# Altium PCB SM619GEFDFST.PcbDoc (part 1 of 3)
Units mm, origin at the board's own origin, x right, y up, seen from the top; angles counter-clockwise.
Board outline 101.04 x 68 mm, 8 copper layers (Top Layer, GND, VCC3+CORE, Signal 1, +5V SATA, Middle Layer 1, GND (Mid8), Bottom Layer), stack 0.633 mm thick; 196 components, 107 nets, 647 pads, 641 vias.
Unrouted connection lines stored in the file: 30.
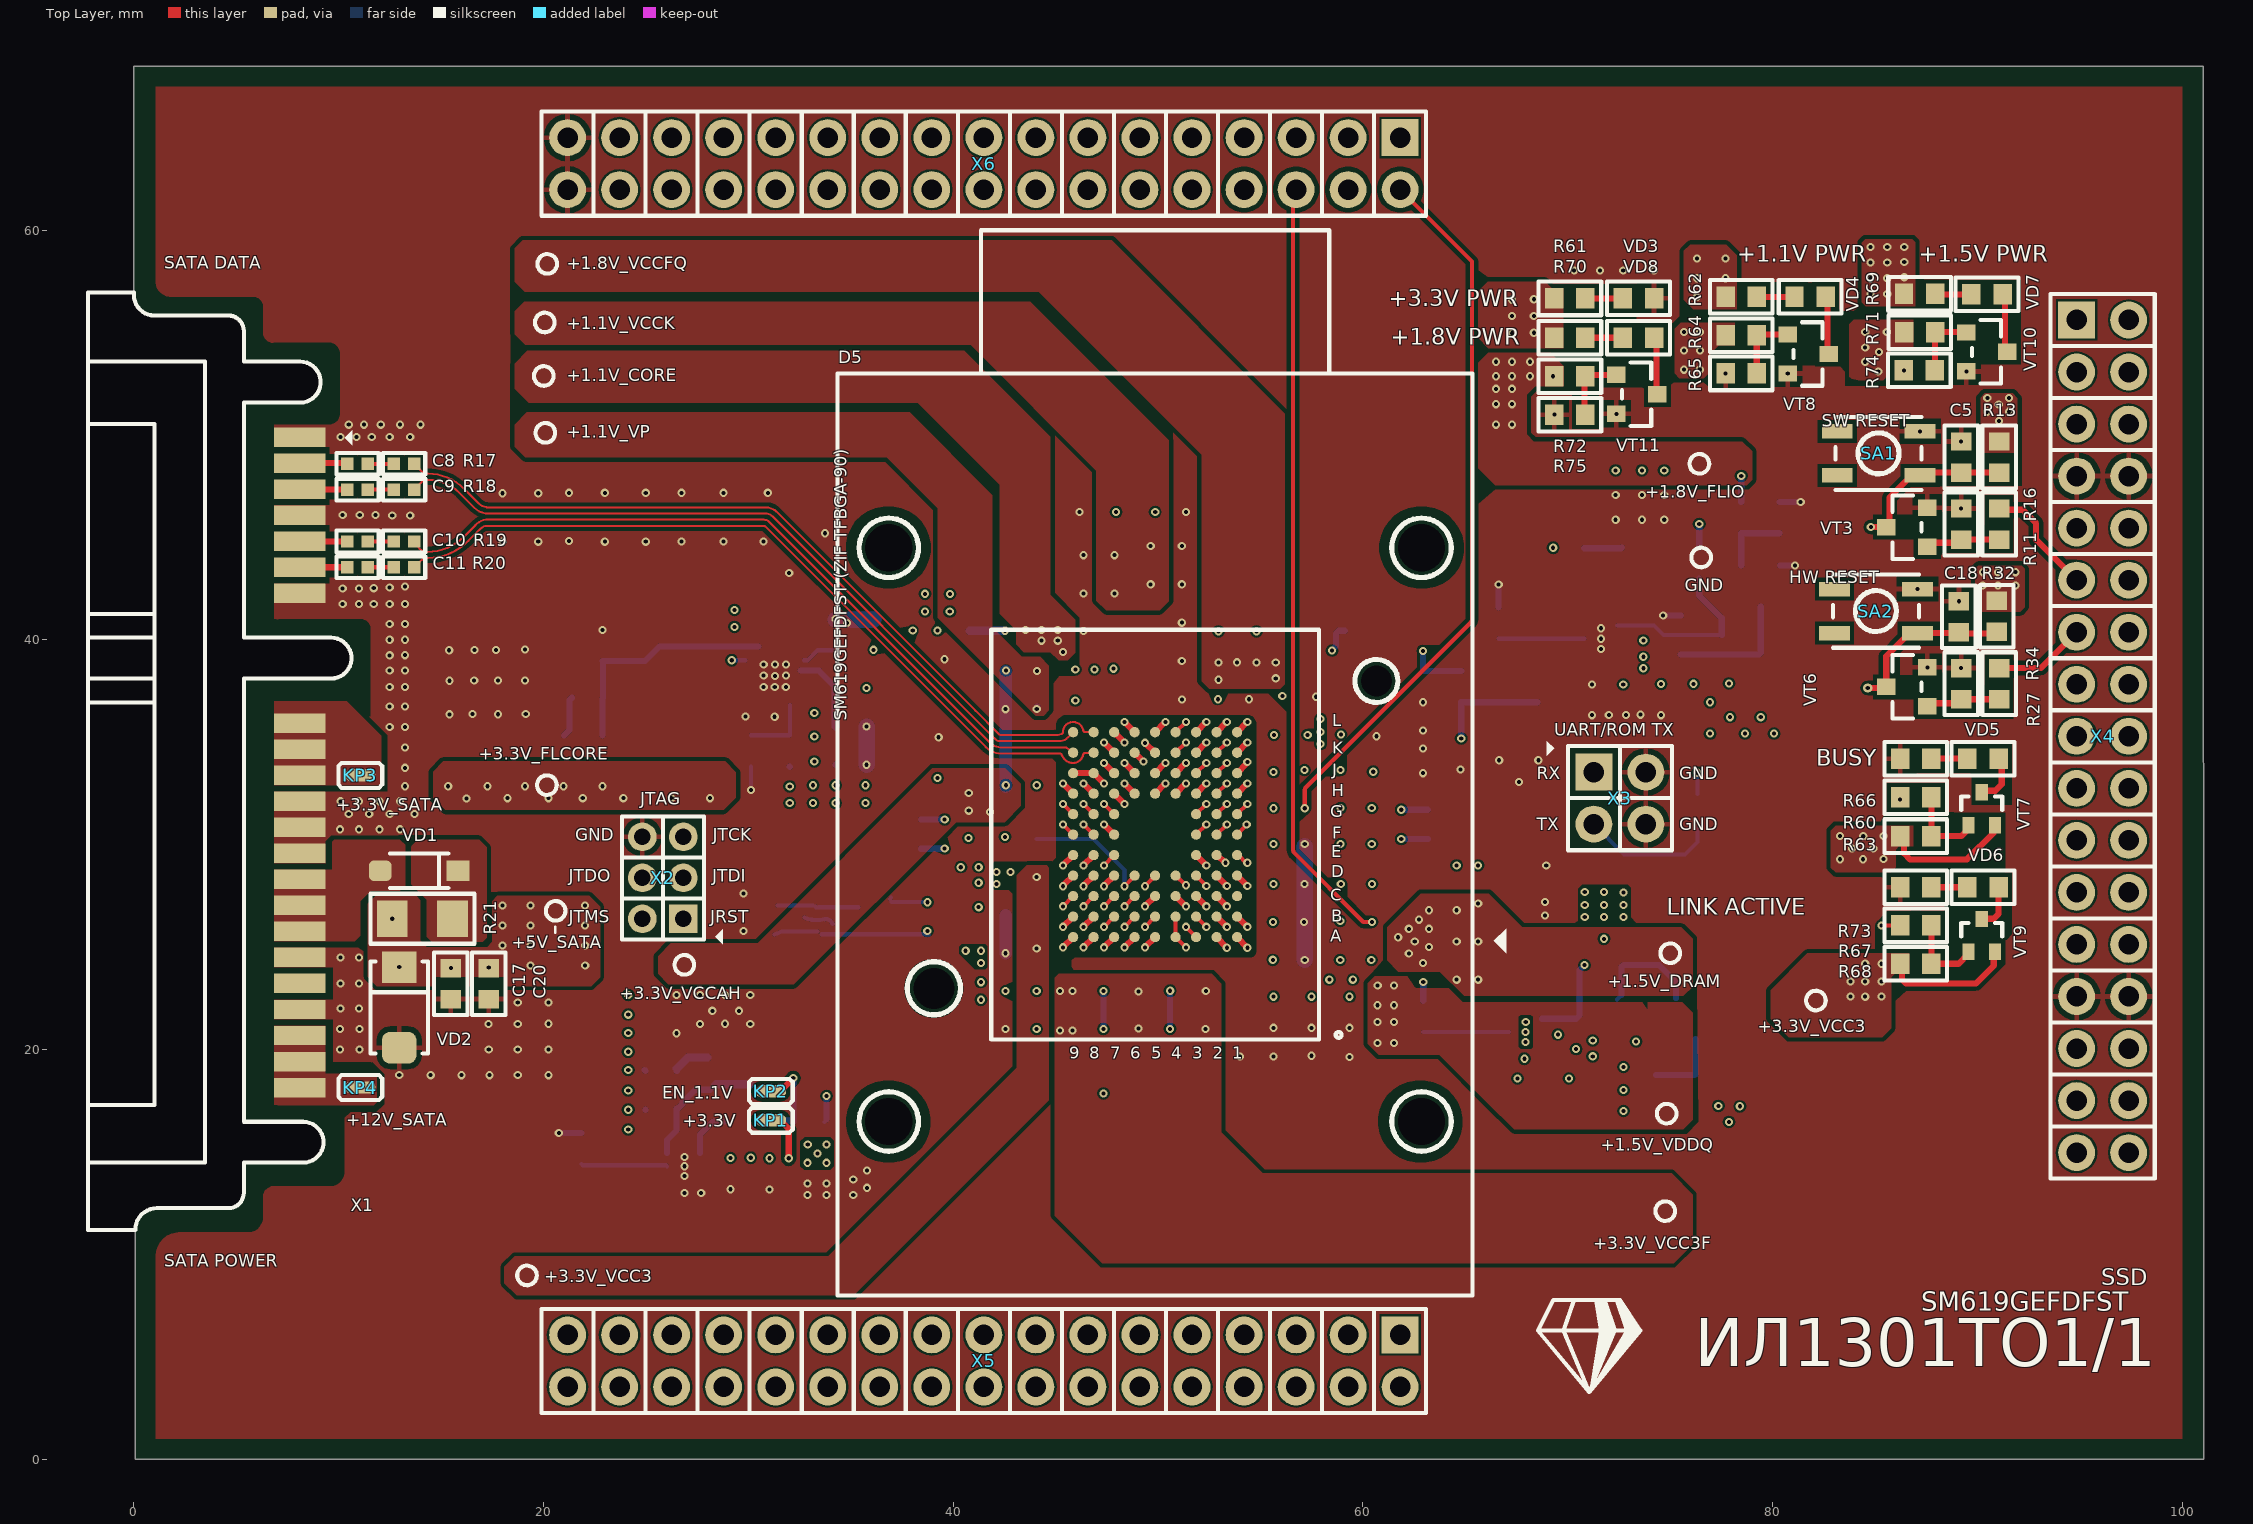
[diagram p0: Top Layer view]
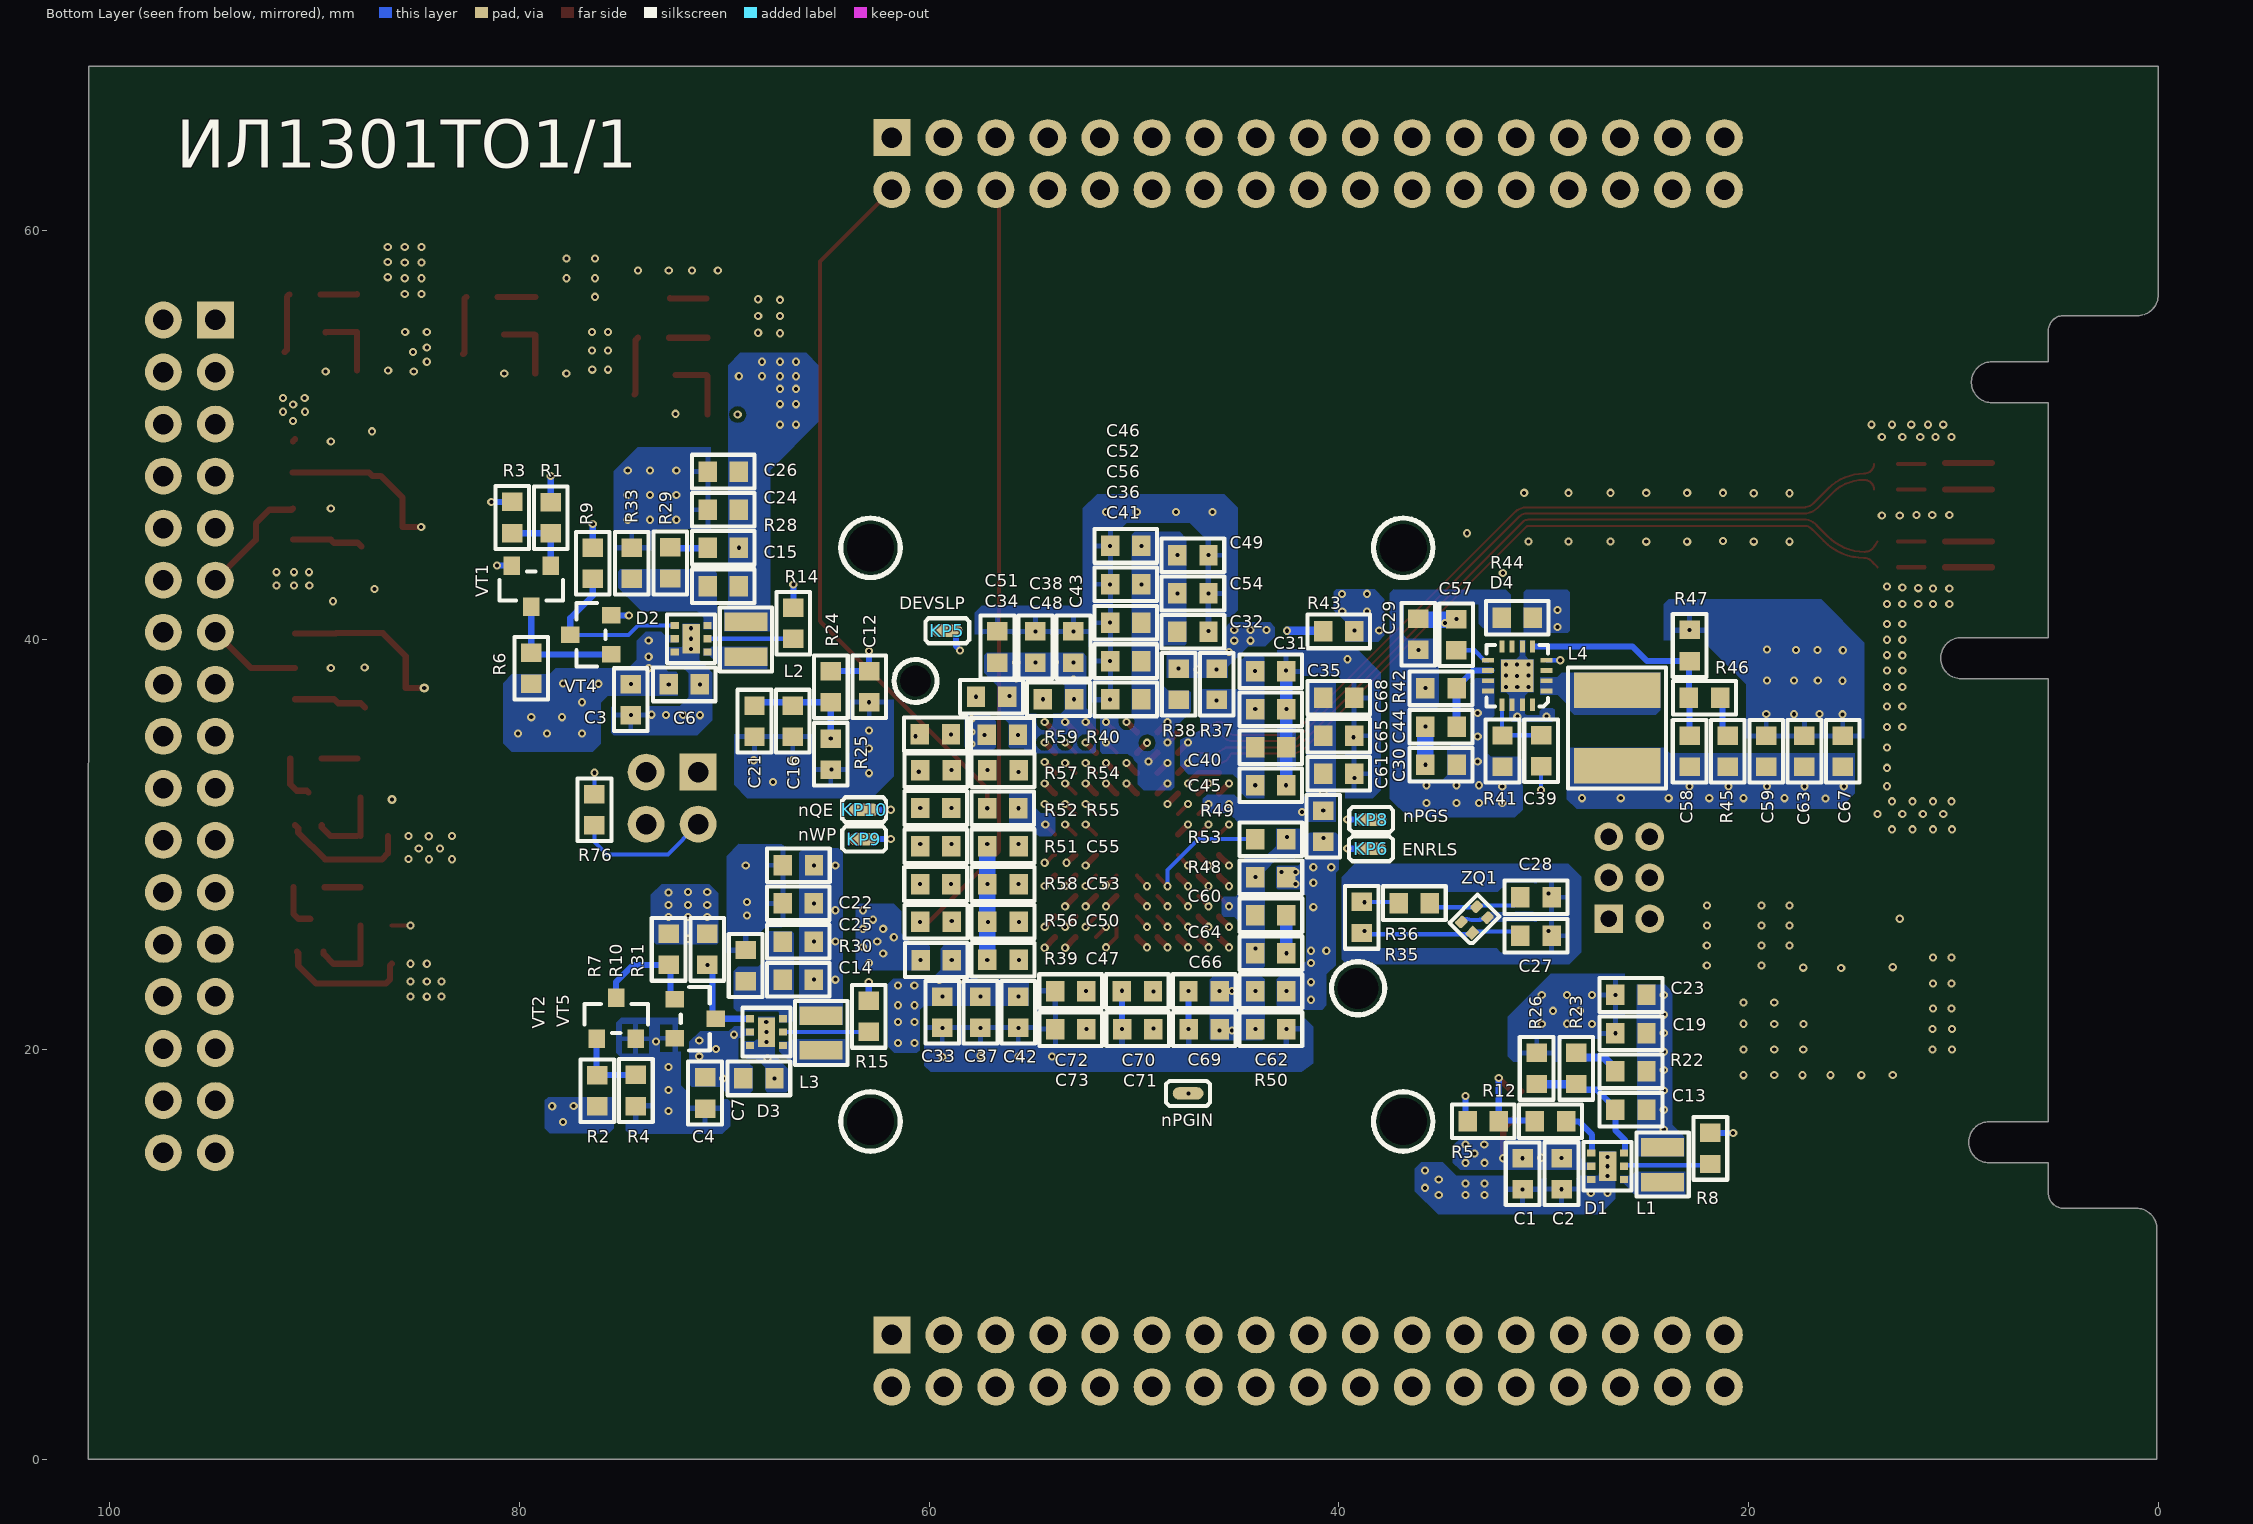
[diagram p1: Bottom Layer view, seen from below]
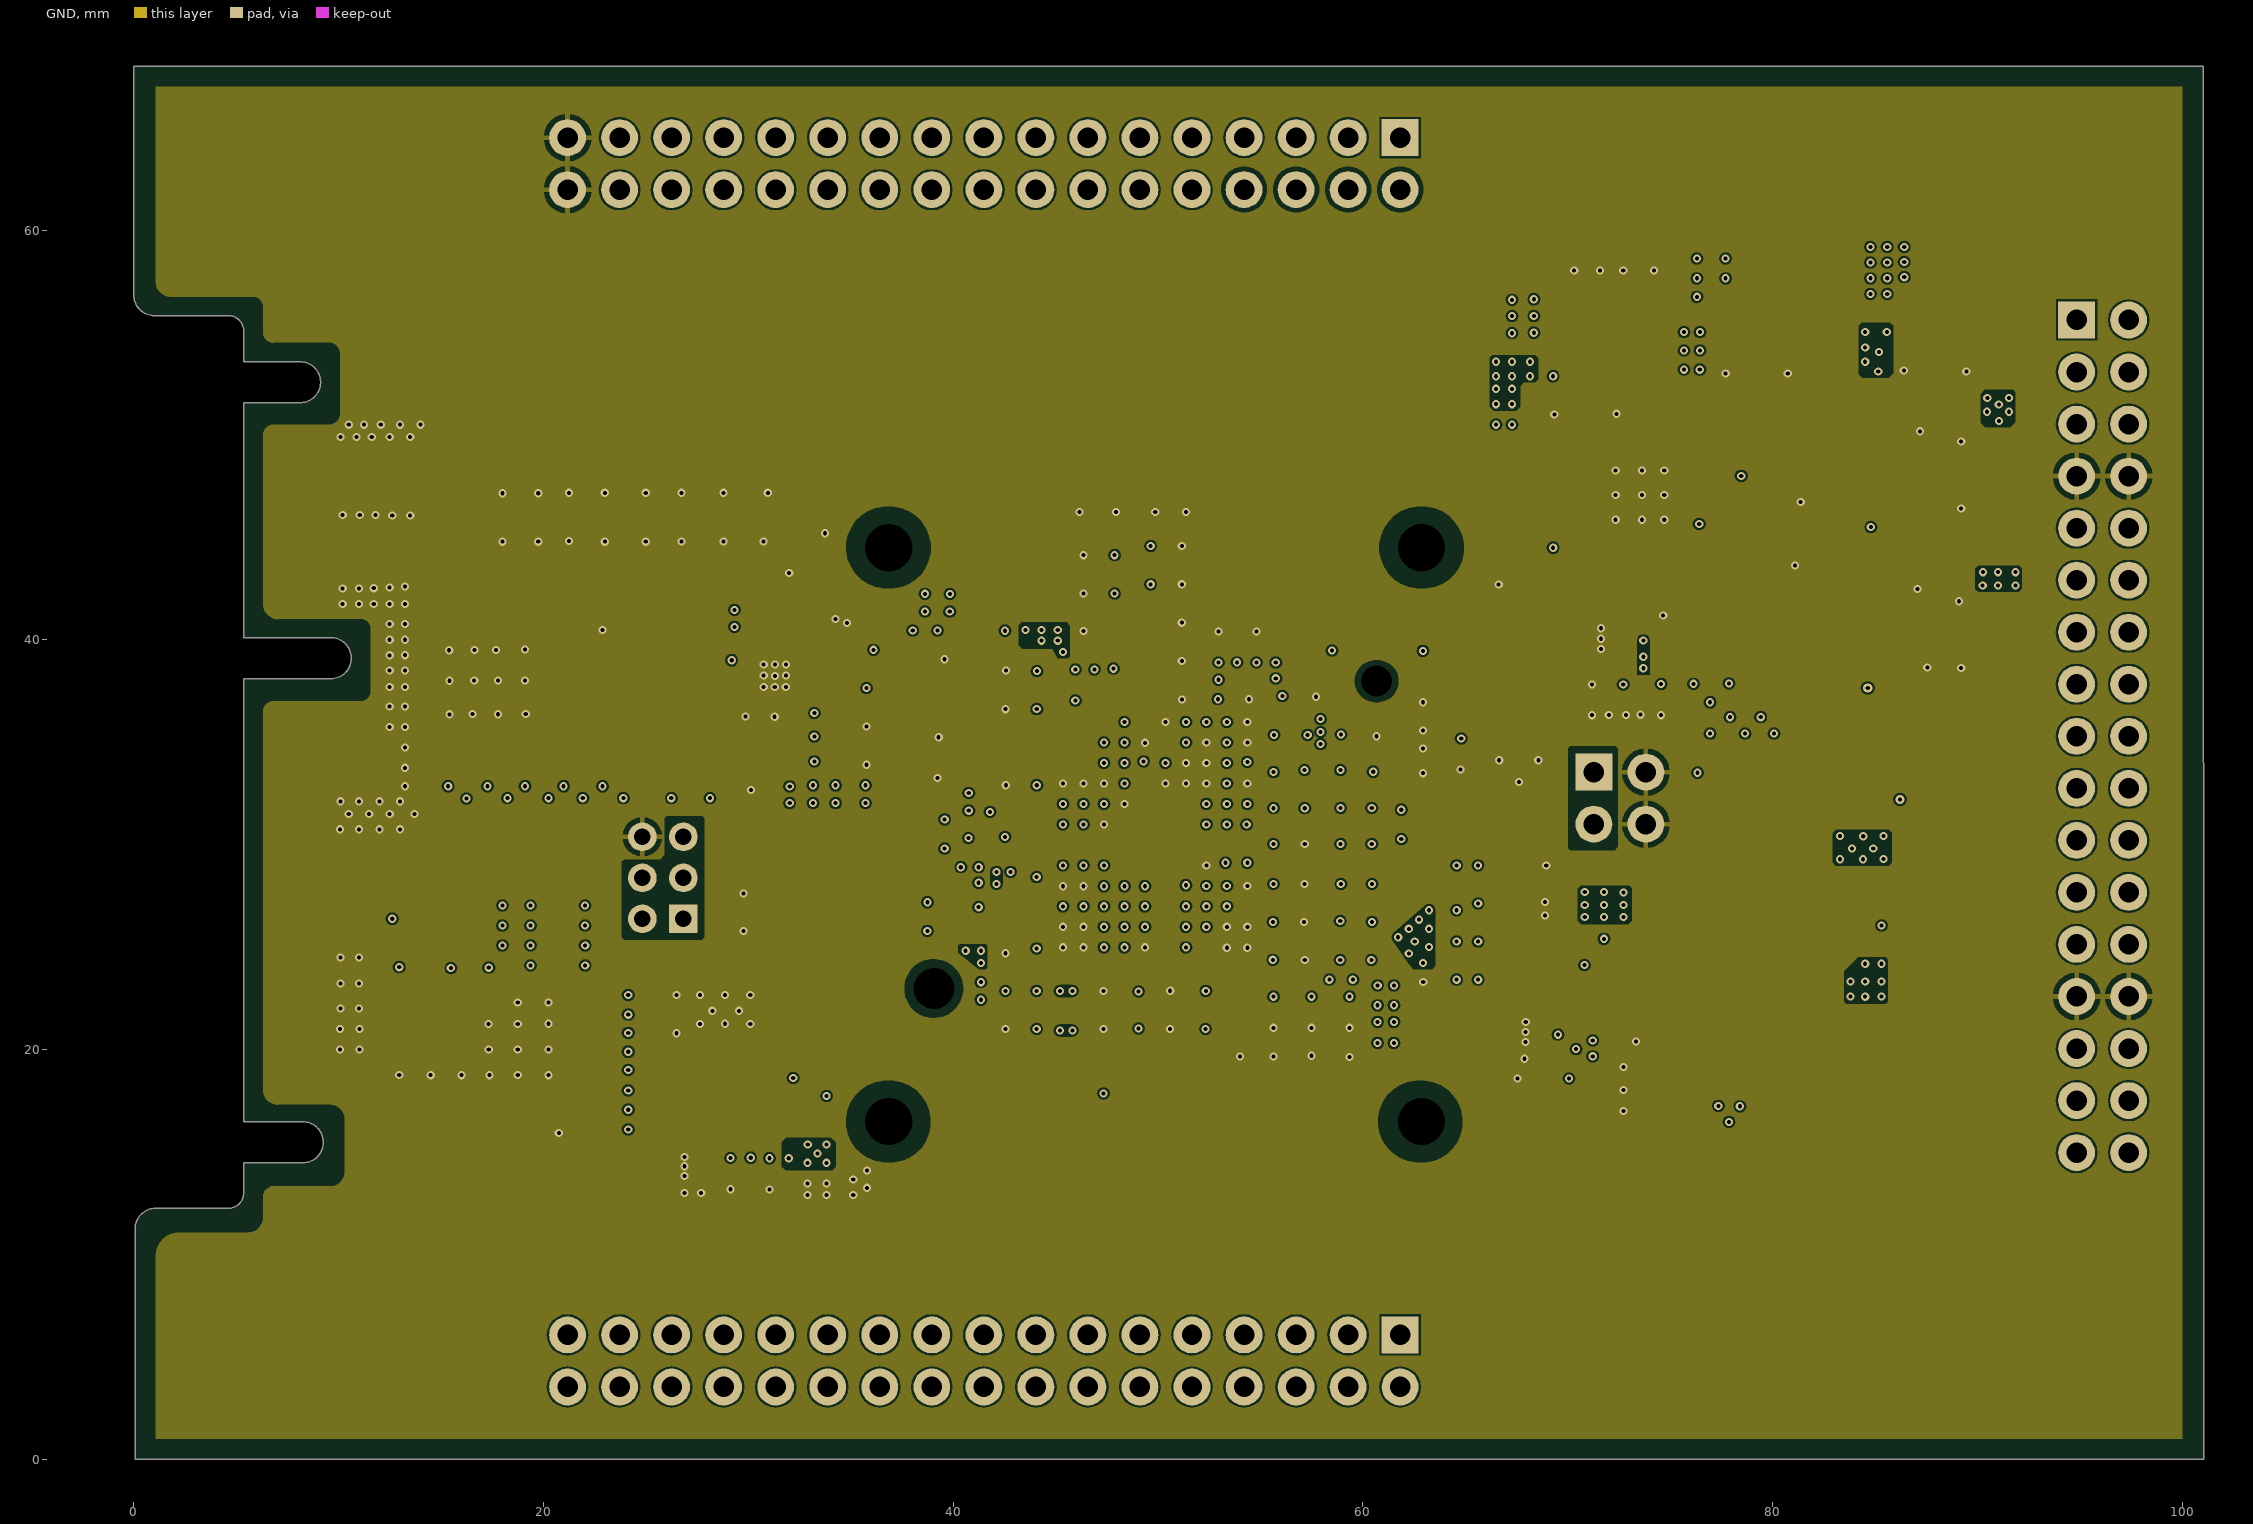
[diagram p2: GND]
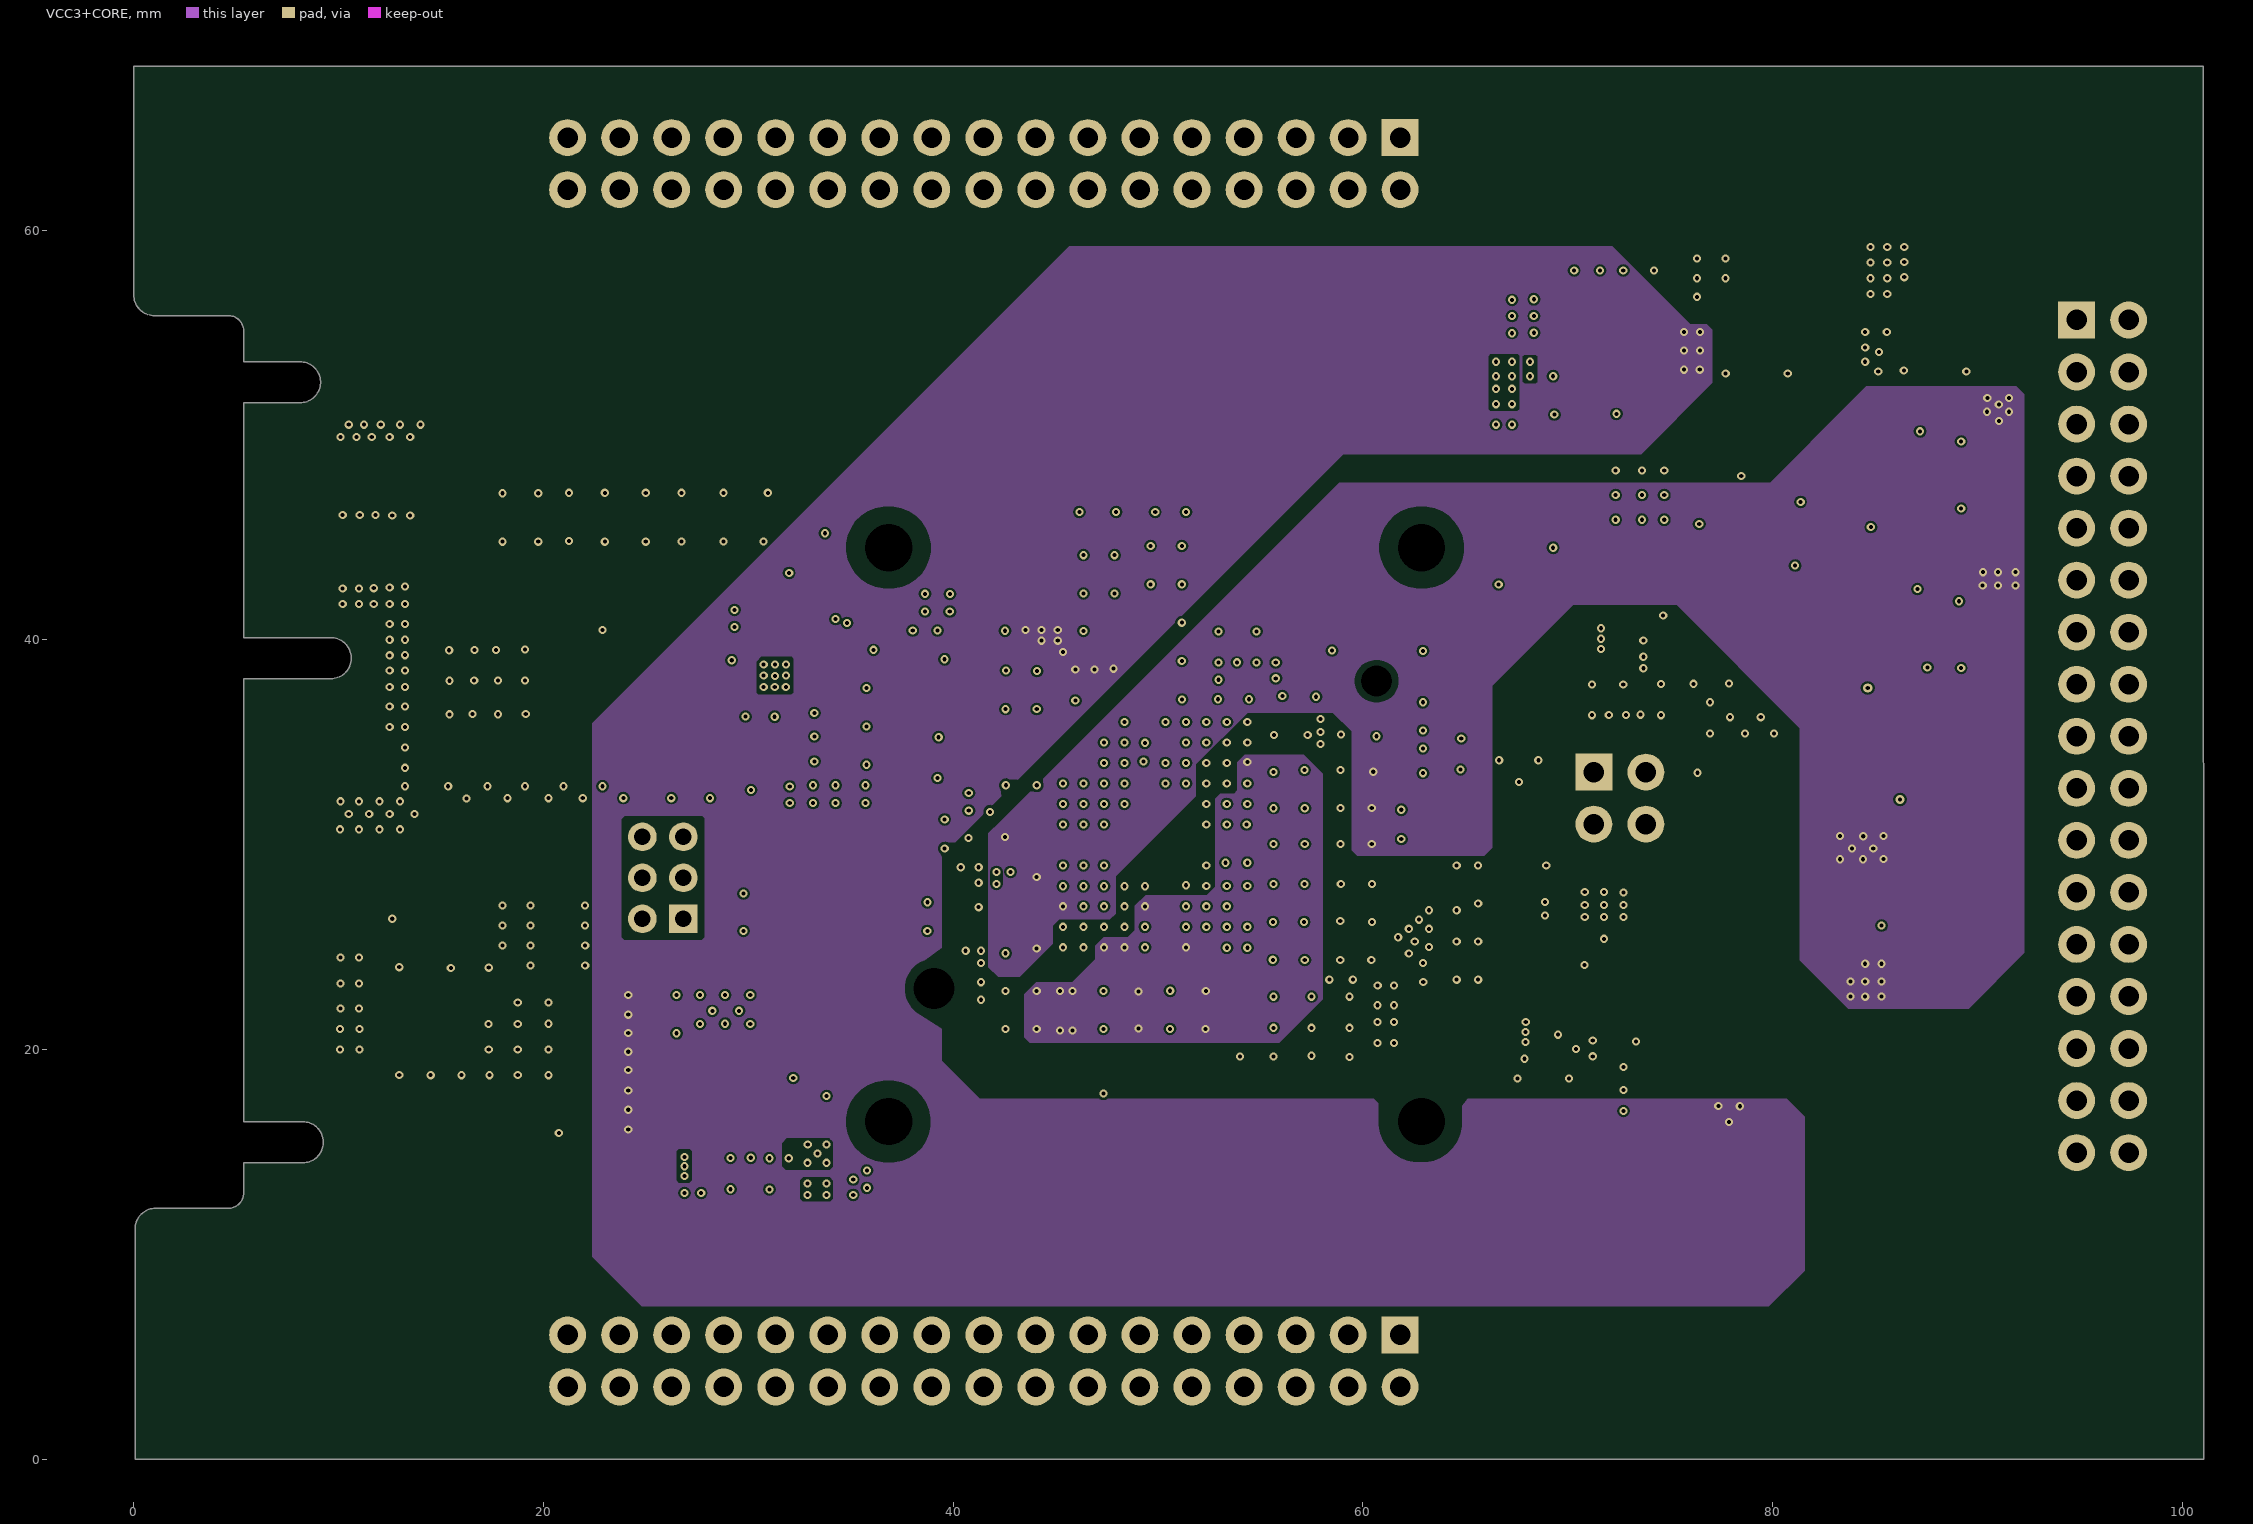
[diagram p3: VCC3+CORE]
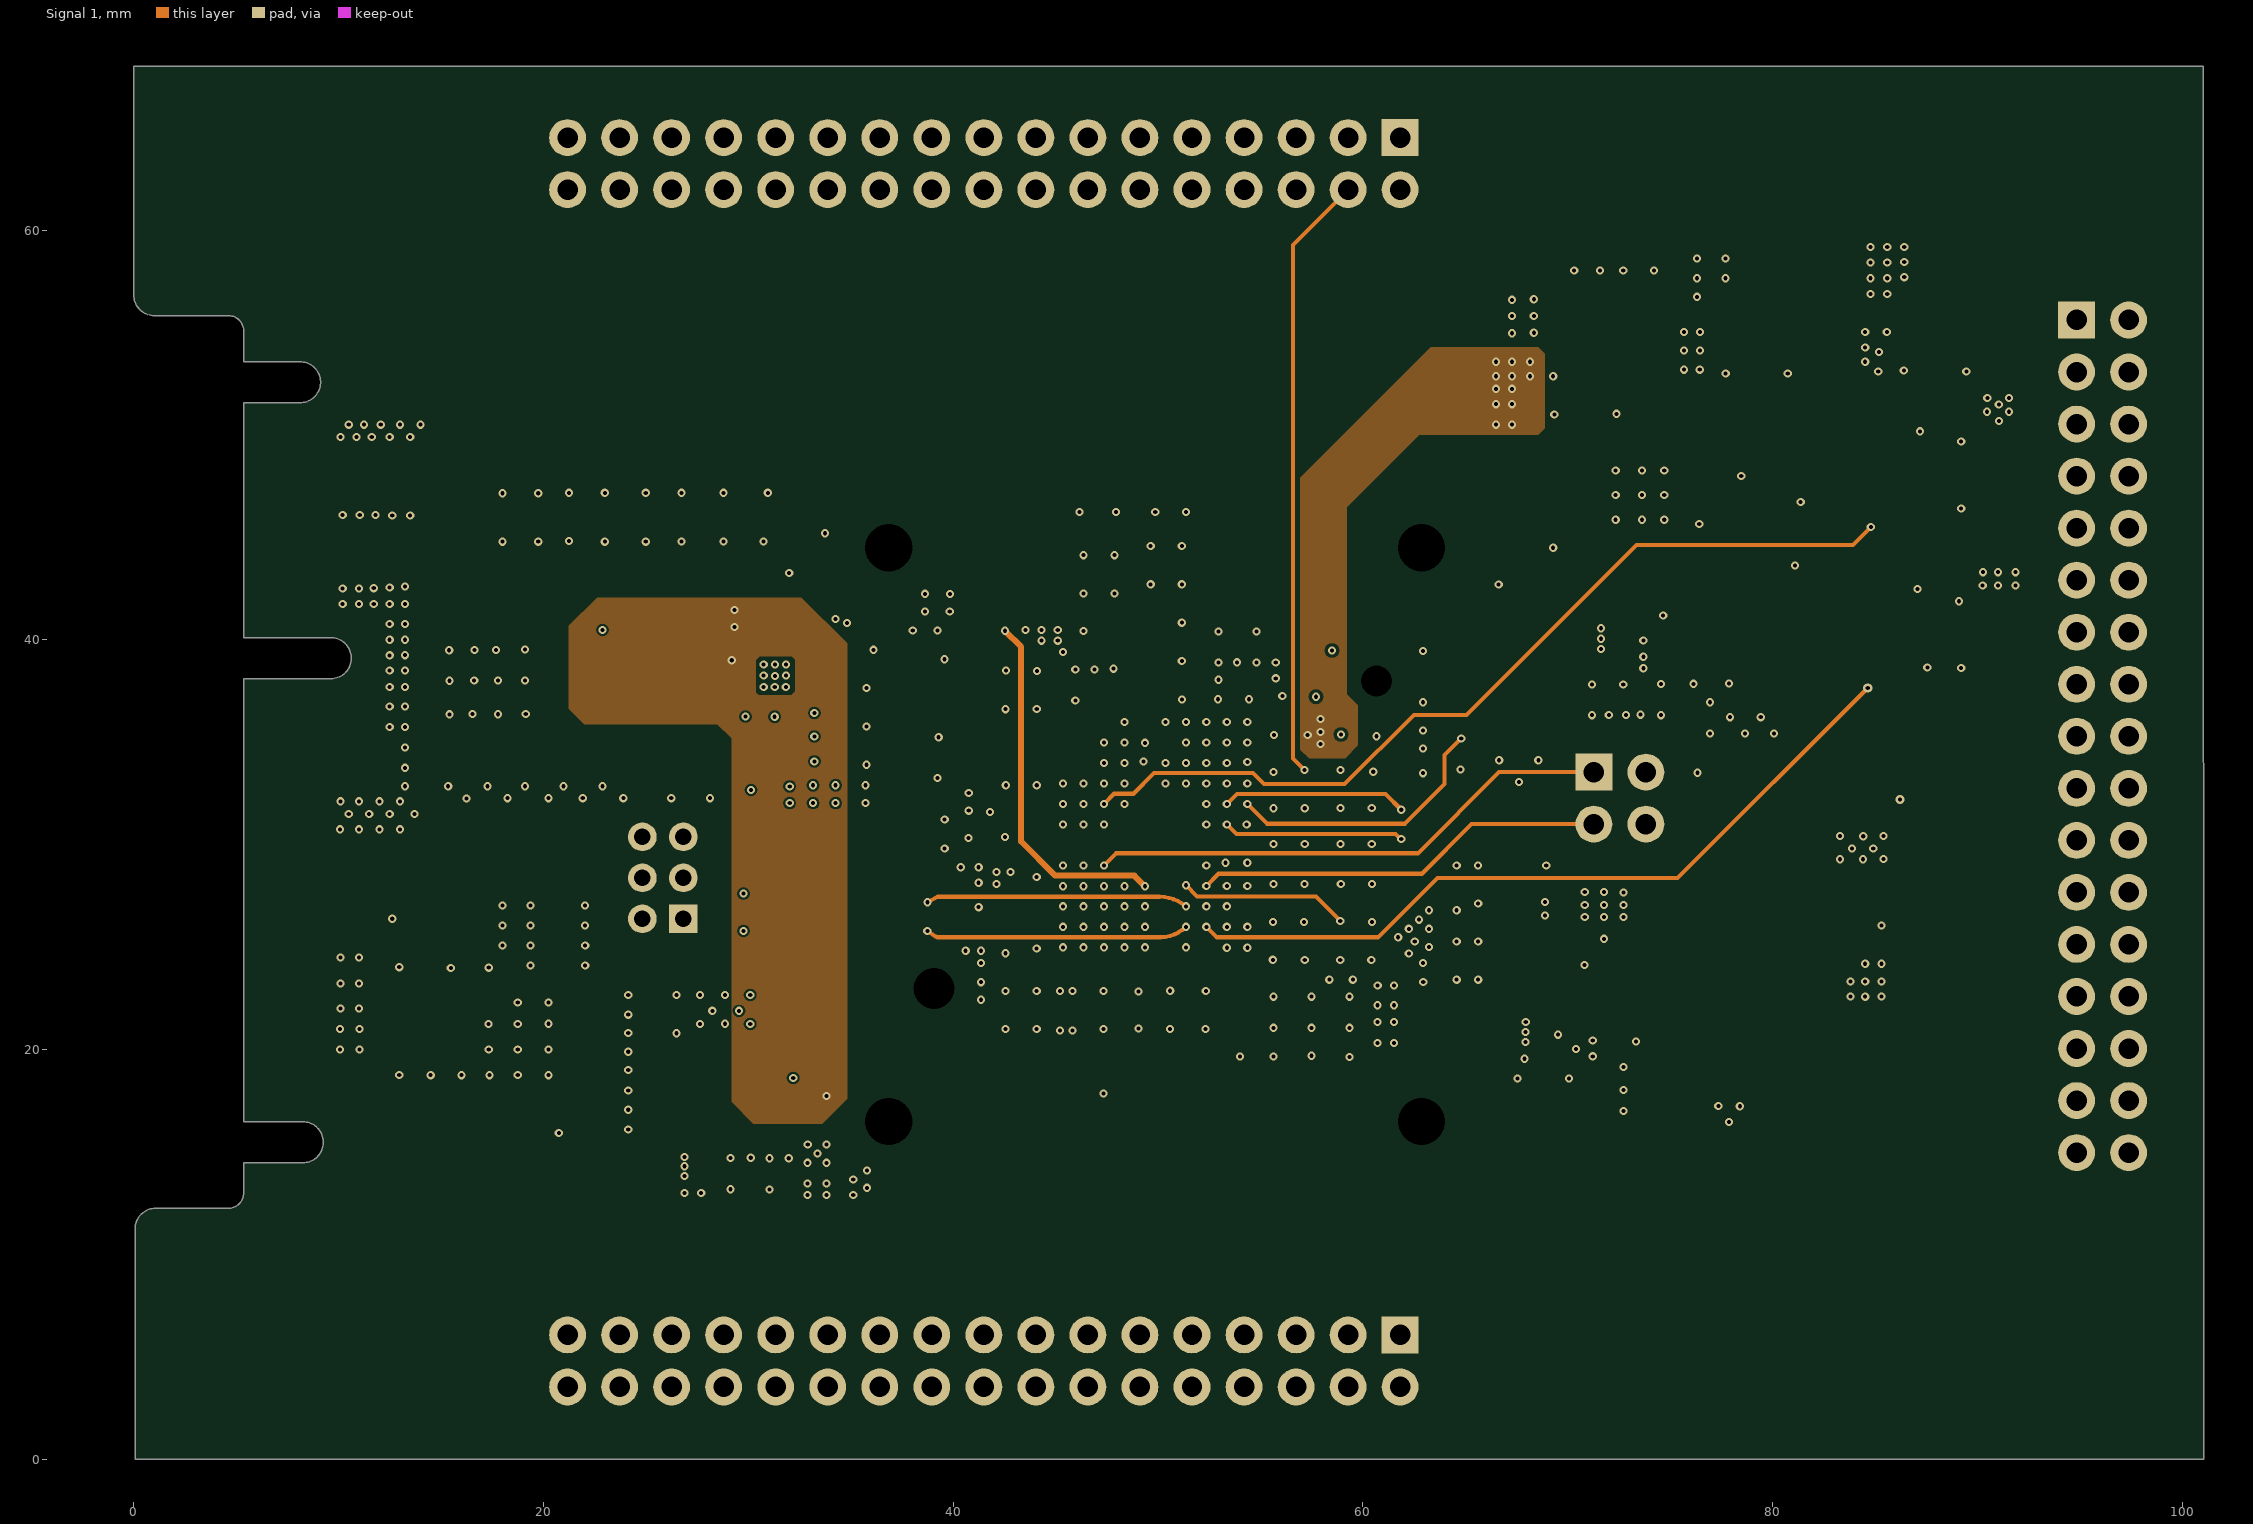
[diagram p4: Signal 1]
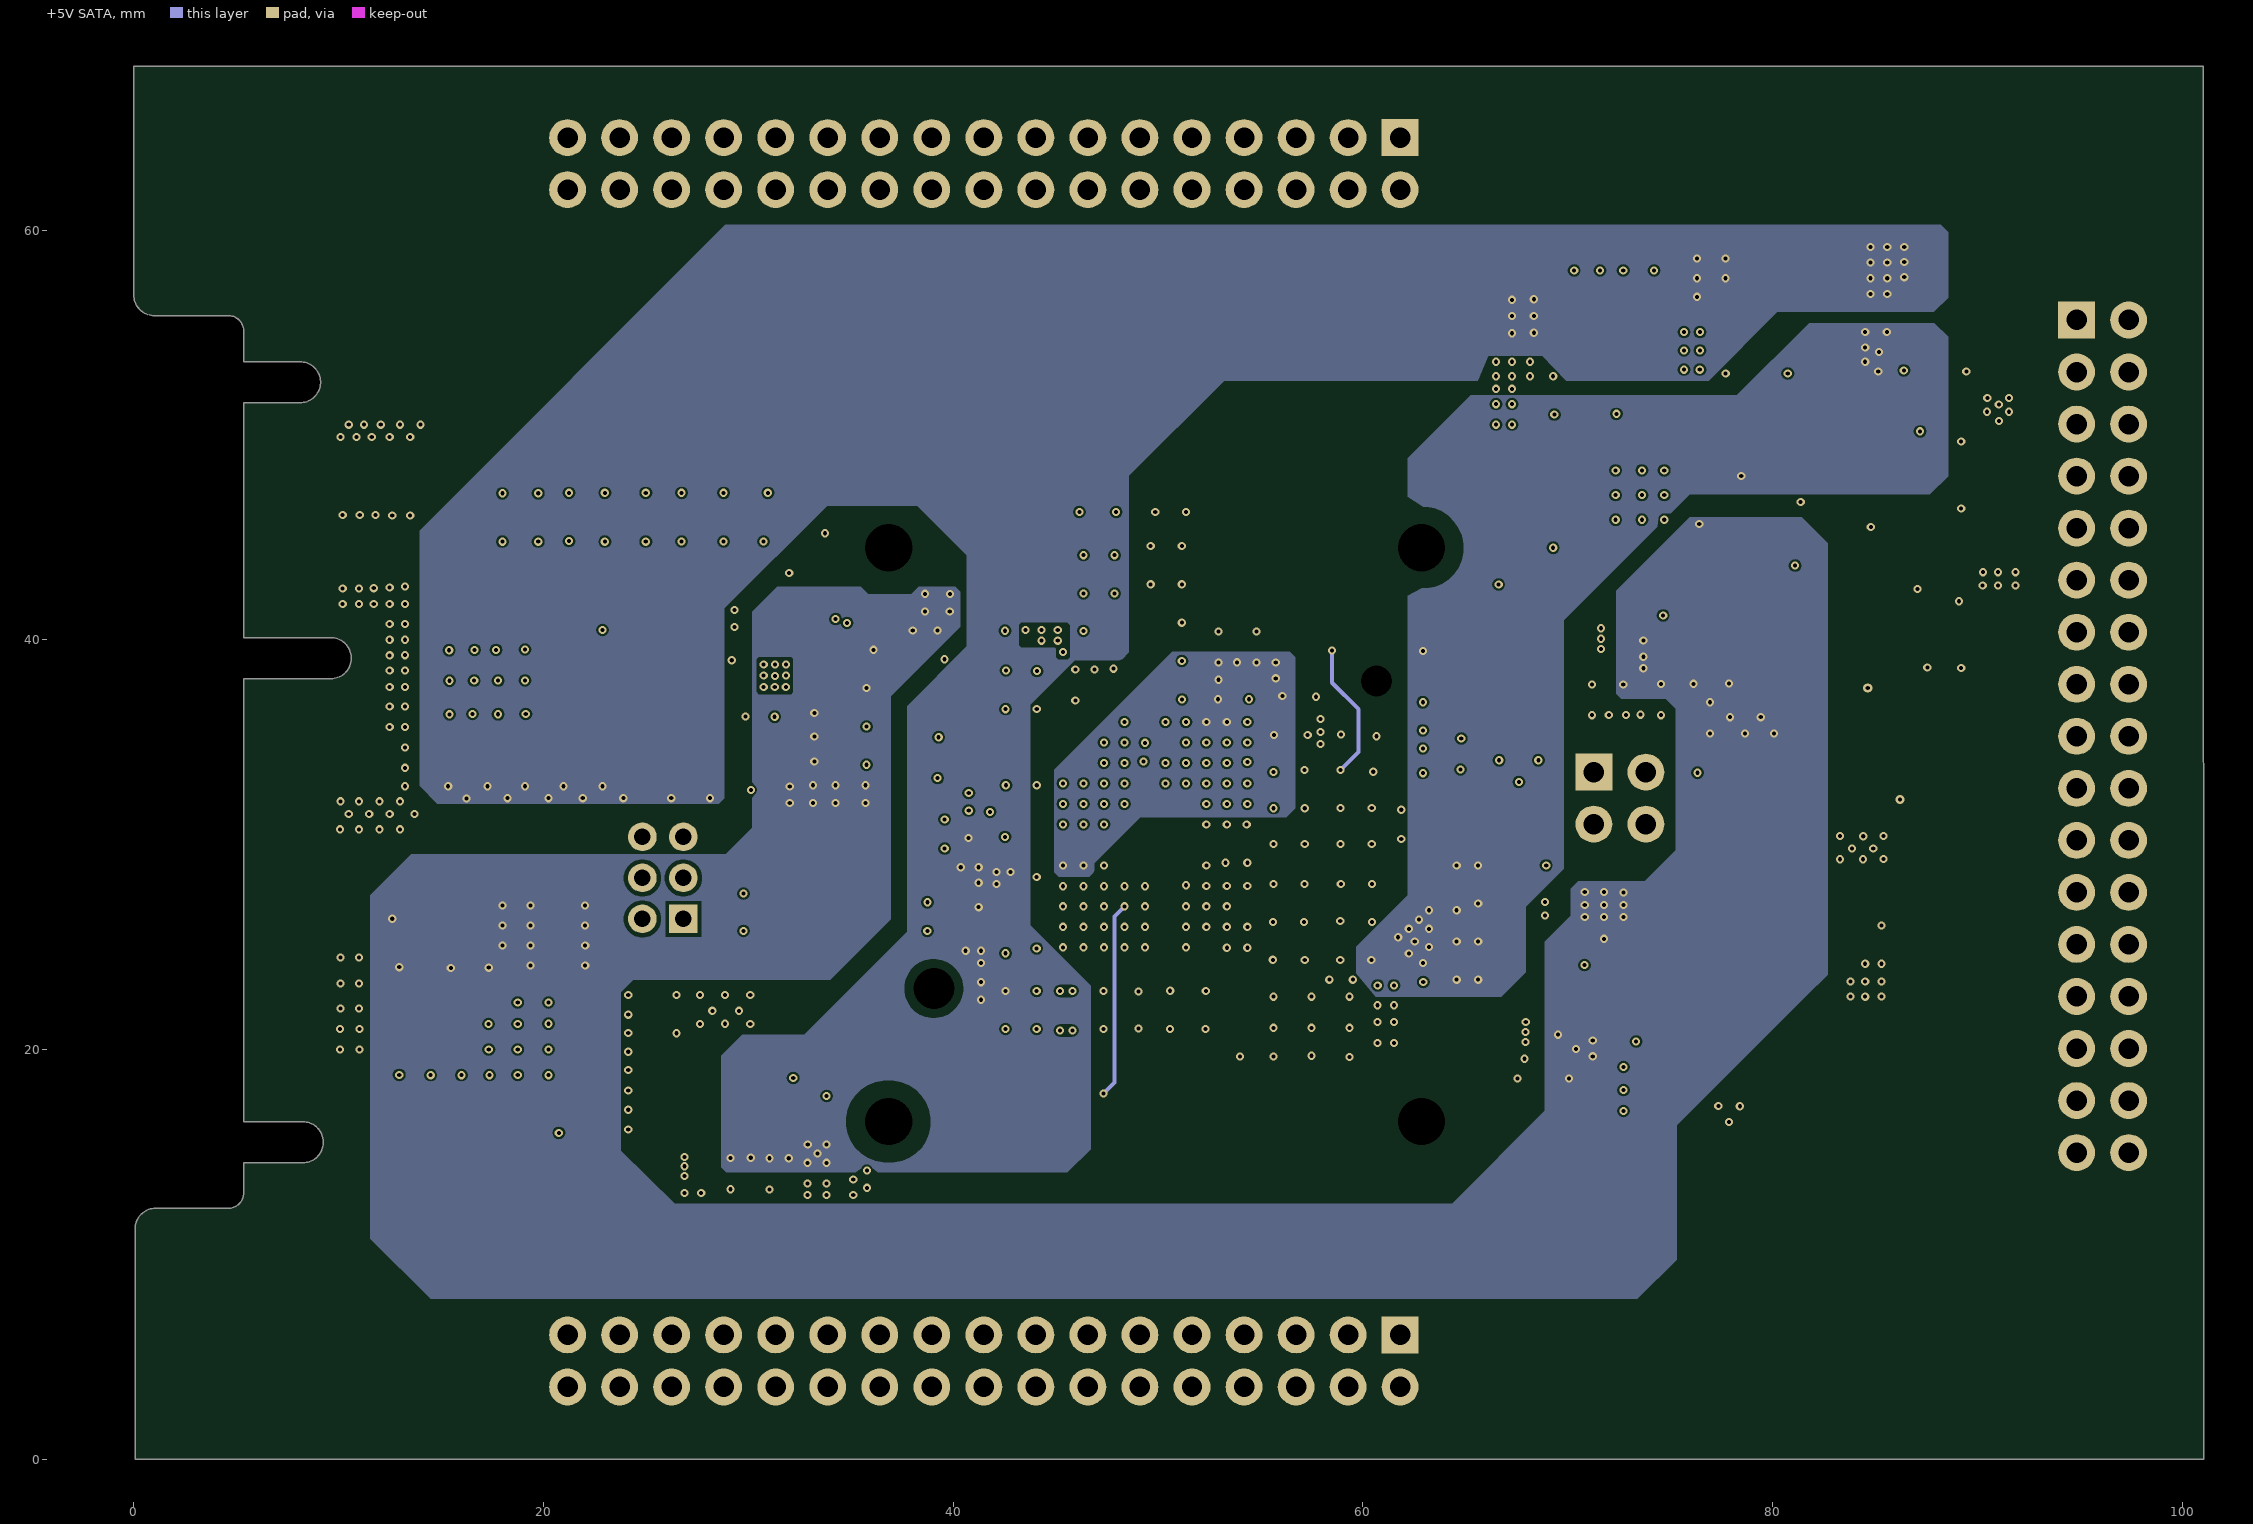
[diagram p5: +5V SATA]
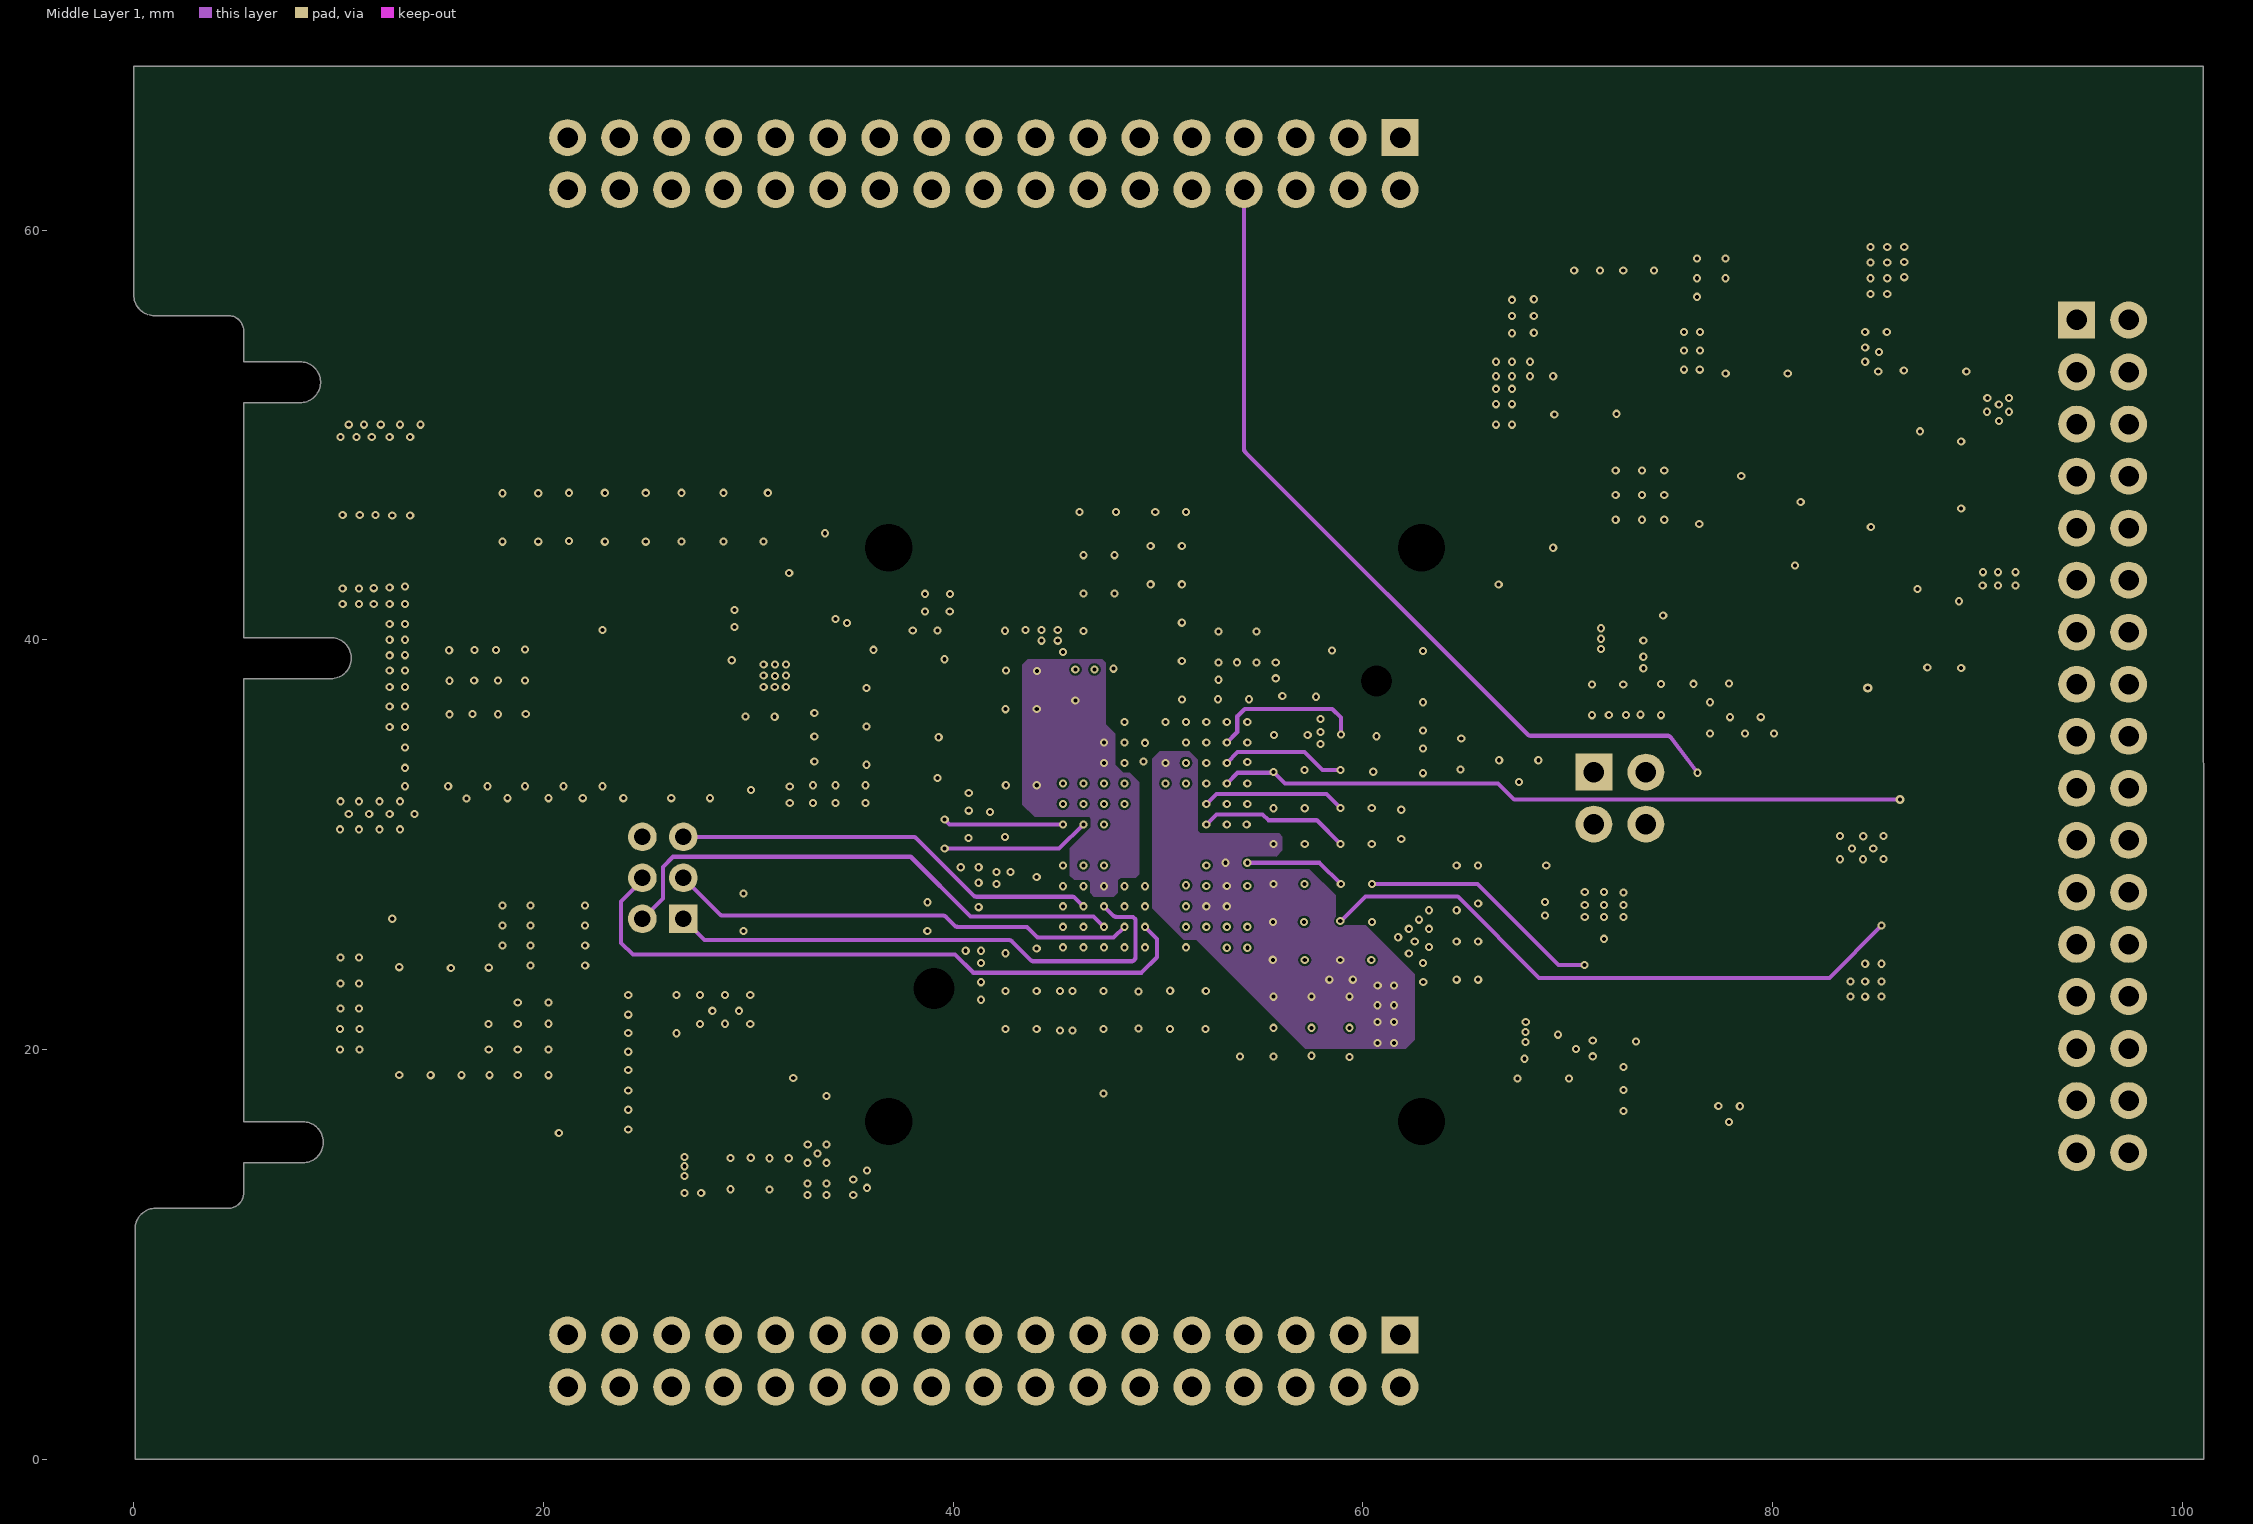
[diagram p6: Middle Layer 1]
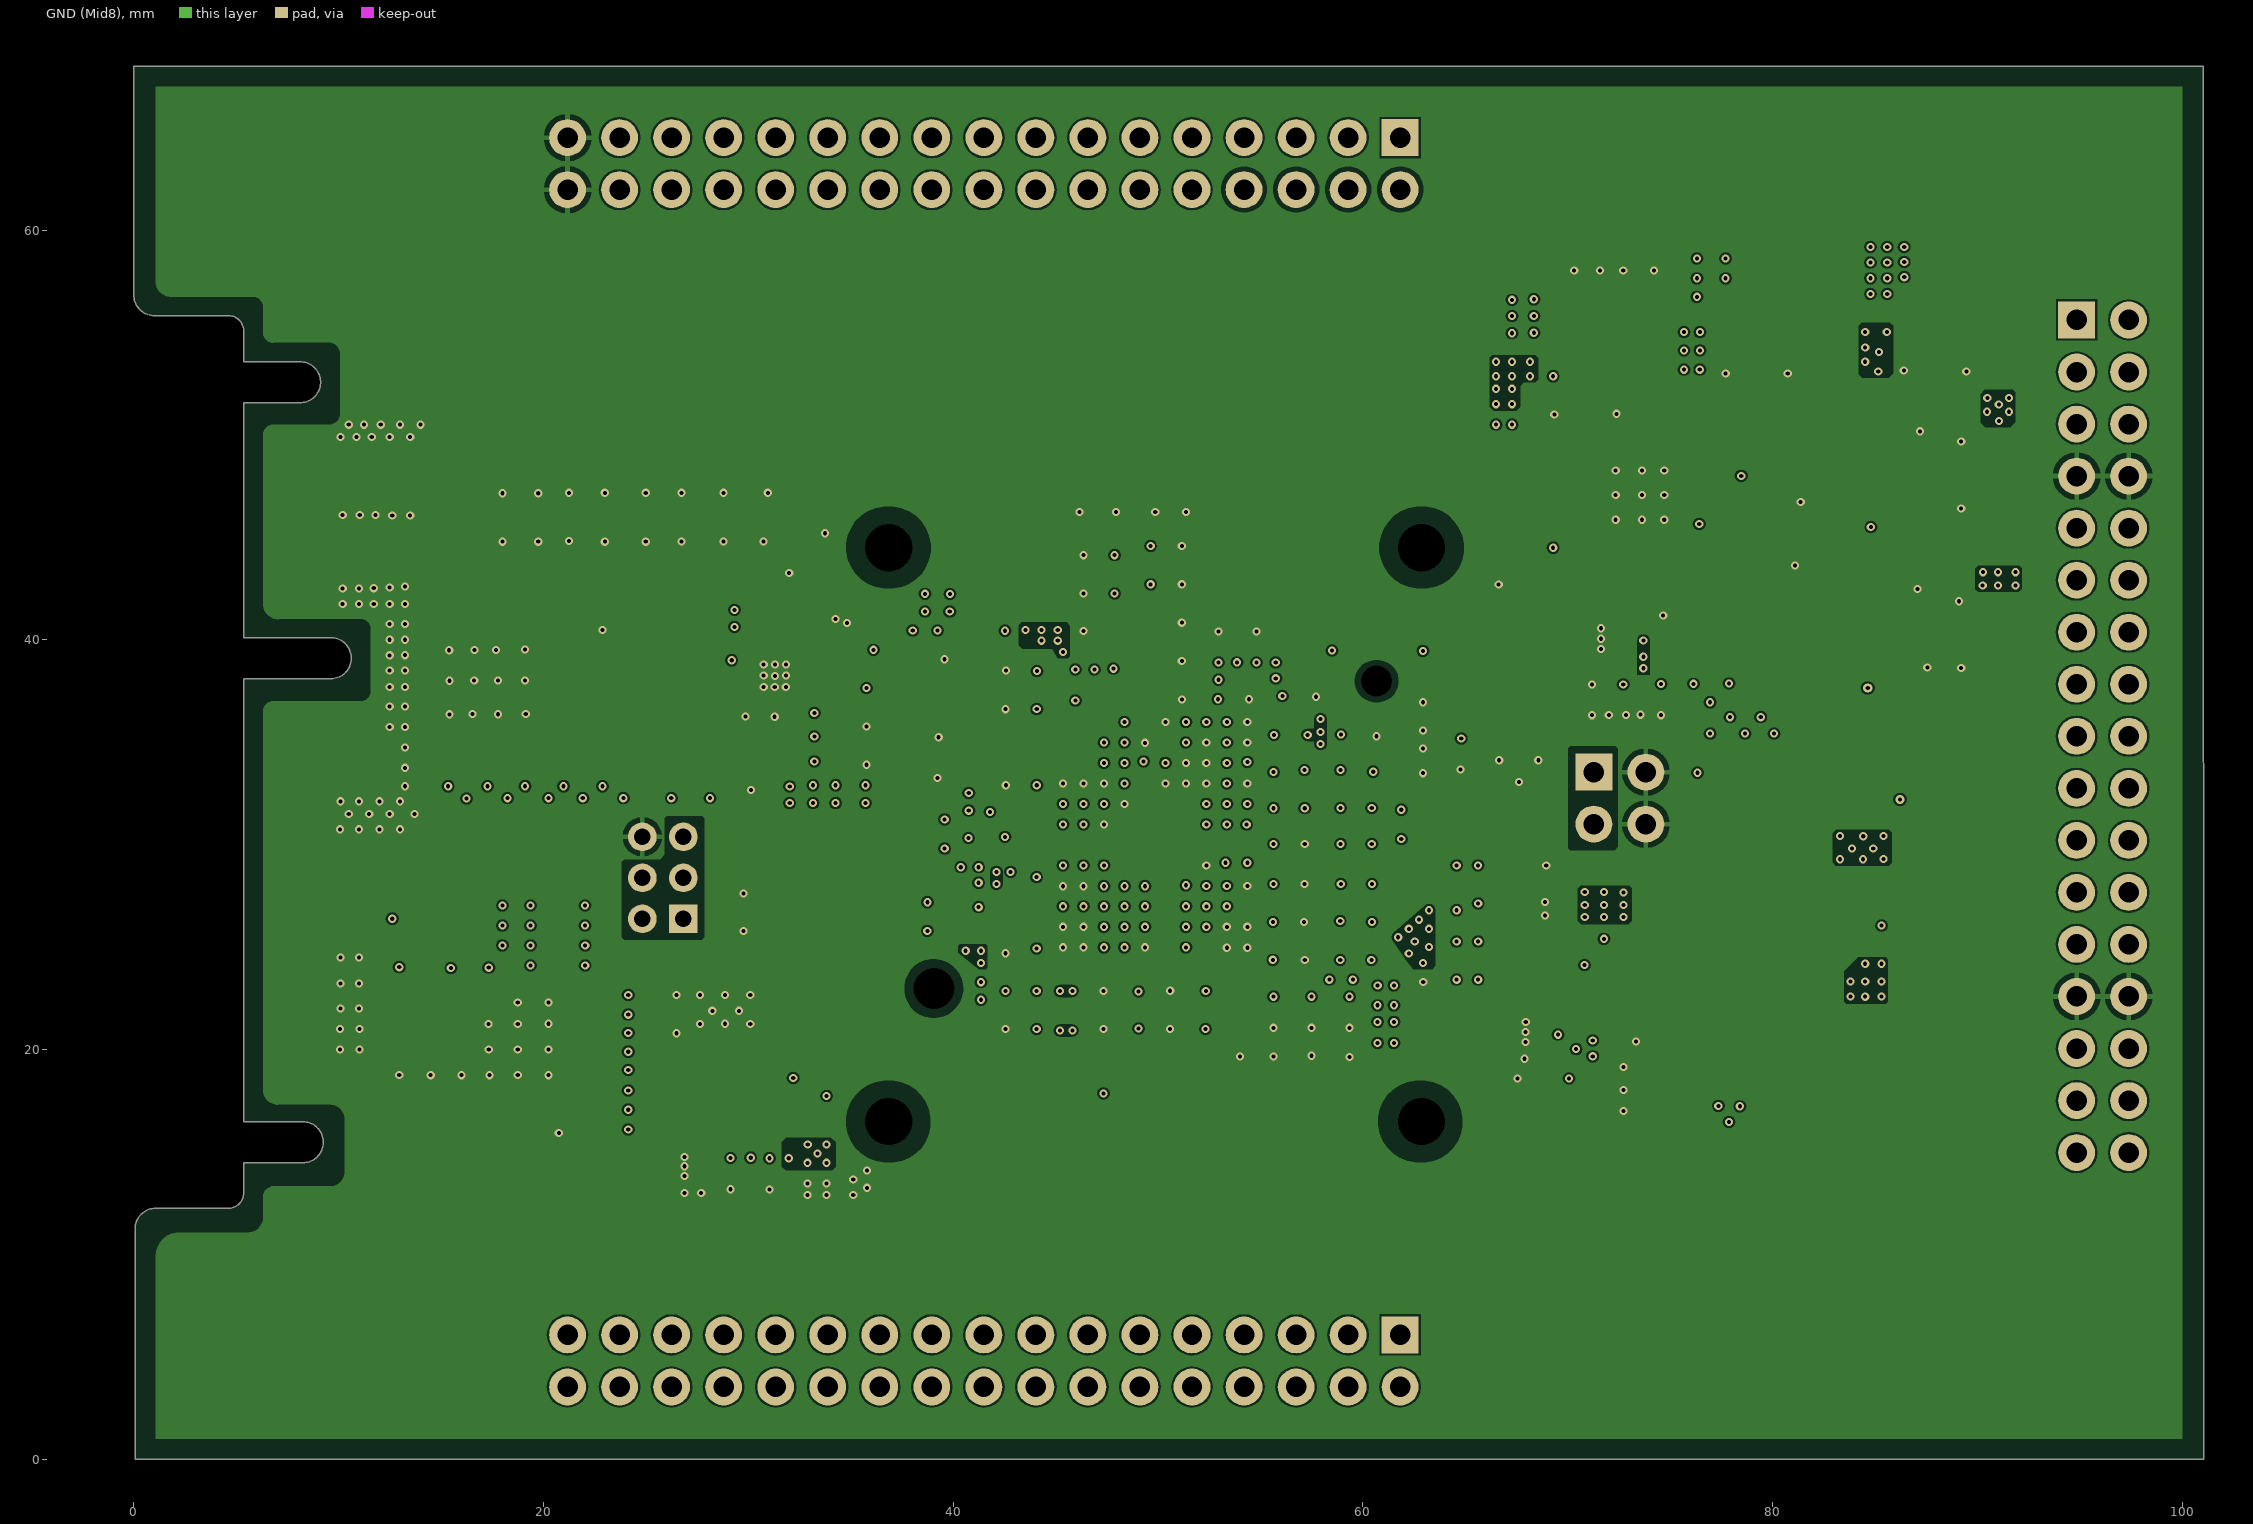
[diagram p7: GND (Mid8)]

## Layer stack, top to bottom
Top Solder: solder mask 0.0102, Solder Resist, Dk 3.5
Top Layer: signal copper 0.04
Dielectric 1: prepreg 0.124, FR-4, Dk 4.2
GND: signal copper 0.0045
Dielectric2: dielectric 0.015, FR-4, Dk 4.8
VCC3+CORE: signal copper 0.018
Dielectric 2: prepreg 0.015, FR-4, Dk 4.2
Signal 1: signal copper 0.018
Dielectric 3: core 0.15, FR-4, Dk 4.2
+5V SATA: signal copper 0.018
Dielectric 4: prepreg 0.015, FR-4, Dk 4.2
Middle Layer 1: signal copper 0.018
Dielectric 5: prepreg 0.015, PP-006, Dk 4.1
GND (Mid8): signal copper 0.018
Dielectric 6: prepreg 0.124, FR-4, Dk 4.2
Bottom Layer: signal copper 0.04
Bottom Solder: solder mask 0.0102, Solder Resist, Dk 3.5

## Board outline
0.075,0 0.075,10.875 0.075,11.253 cw(c1.075,11.253) 1.075,12.253 4.625,12.253 ccw(c4.625,13.003) 5.375,13.003 5.375,14.473 8.262,14.473 ccw(c8.262,15.473) 8.262,16.473 5.375,16.473 5.375,38.103 9.629,38.103 ccw(c9.629,39.103) 9.629,40.103 5.375,40.103 5.375,51.573 8.125,51.573 ccw(c8.125,52.573) 8.125,53.573 5.375,53.573 5.375,55.073 ccw(c4.625,55.073) 4.625,55.823 1.011,55.823 cw(c1.011,56.823) 0.011,56.823 0.011,68 101.012,68 101.05,0

## Design rules (kind name [scope] priority, off if disabled: settings)
AssemblyTestPointUsage [All] p1 off:
AssemblyTestpoint [All] p1 off: testpointundercomponent=TRUE minsize=1.016 maxsize=2.54 preferedsize=1.524 minholesize=0 maxholesize=1.016 preferedholesize=0.813 testpointgrid=0.025 usegrid=TRUE gridtolerance=0 allowsidetop=TRUE allowsidebottom=TRUE
Clearance Clearance_X1 [X1 AND OnTopLayer] p1: gap=0.2 ignorepadtopadclearanceinfootprint=FALSE except(0: Arc-Hole Track-Hole SMDPad-Hole THPad-Hole Via-Hole Fill-Hole Poly-Hole Region-Hole Text-Hole)
Clearance Clearance_Bottom [OnLayer('Bottom Layer')] p2: gap=0.2 ignorepadtopadclearanceinfootprint=FALSE except(0: Arc-Hole Track-Hole SMDPad-Hole THPad-Hole Via-Hole Fill-Hole Poly-Hole Region-Hole Text-Hole; 0.1: Arc-SMDPad Arc-THPad Track-SMDPad Track-THPad SMDPad-SMDPad SMDPad-THPad THPad-THPad)
Clearance Clearance_GND [((OnLayer('Top Layer') OR OnLayer('GND')) AND InNet('GND'))] p3: gap=0.1 ignorepadtopadclearanceinfootprint=FALSE except(0: Arc-Hole Track-Hole SMDPad-Hole THPad-Hole Via-Hole Fill-Hole Poly-Hole Region-Hole Text-Hole; 0.2: Arc-Poly Track-Poly Fill-Poly Poly-Poly)
Clearance Clearance_+1.8V_FLIO [((OnLayer('Bottom Layer') OR OnLayer('Top Layer')) AND InNet('+1.8V_FLIO') AND InPolygon)] p4: gap=0.1 ignorepadtopadclearanceinfootprint=FALSE except(0: Arc-Hole Track-Hole SMDPad-Hole THPad-Hole Via-Hole Fill-Hole Poly-Hole Region-Hole Text-Hole)
Clearance Clearance_+1.5V_DRAM [All vs ((OnLayer('Bottom Layer') OR OnLayer('Top Layer') OR OnLayer('+5V SATA')) AND InNet('+1.5V_DRAM') AND InPolygon)] p5: gap=0.1 ignorepadtopadclearanceinfootprint=FALSE except(0: Arc-Hole Track-Hole SMDPad-Hole THPad-Hole Via-Hole Fill-Hole Poly-Hole Region-Hole Text-Hole)
Clearance Clearance_nDF [All vs (OnLayer('Bottom Layer') AND InNet('nDF') AND InPolygon)] p6: gap=0.1 ignorepadtopadclearanceinfootprint=FALSE except(0: Arc-Hole Track-Hole SMDPad-Hole THPad-Hole Via-Hole Fill-Hole Poly-Hole Region-Hole Text-Hole)
Clearance Clearance_+1.8V_VCCFQ [All vs ((OnLayer('Bottom Layer') OR OnLayer('Top Layer') OR OnLayer('+5V SATA')) AND InNet('+1.8V_VCCFQ') AND InPolygon)] p7: gap=0.1 ignorepadtopadclearanceinfootprint=FALSE except(0: Arc-Hole Track-Hole SMDPad-Hole THPad-Hole Via-Hole Fill-Hole Poly-Hole Region-Hole Text-Hole)
Clearance Clearance_+1.1V_VCCK [((OnLayer('Bottom Layer') OR OnLayer('Top Layer')) AND InNet('+1.1V_VCCK') AND InPolygon)] p8: gap=0.1 ignorepadtopadclearanceinfootprint=FALSE except(0: Arc-Hole Track-Hole SMDPad-Hole THPad-Hole Via-Hole Fill-Hole Poly-Hole Region-Hole Text-Hole)
Clearance Clearance_+3.3V_VCC3F [((OnLayer('Bottom Layer')  OR OnLayer('VCC3+CORE') OR OnLayer('Top Layer'))AND InNet('+3.3V_VCC3F') AND InPolygon)] p9: gap=0.1 ignorepadtopadclearanceinfootprint=FALSE except(0: Arc-Hole Track-Hole SMDPad-Hole THPad-Hole Via-Hole Fill-Hole Poly-Hole Region-Hole Text-Hole)
Clearance Clearance_+3.3V_VCCAH [((OnLayer('Bottom Layer') OR OnLayer('Top Layer')) AND InNet('+3.3V_VCCAH') AND InPolygon)] p10: gap=0.1 ignorepadtopadclearanceinfootprint=FALSE except(0: Arc-Hole Track-Hole SMDPad-Hole THPad-Hole Via-Hole Fill-Hole Poly-Hole Region-Hole Text-Hole)
Clearance Clearance_+3.3V_VCC3 [((OnLayer('Bottom Layer') OR OnLayer('VCC3+CORE') OR OnLayer('Top Layer')) AND InNet('+3.3V_VCC3') AND InPolygon)] p11: gap=0.1 ignorepadtopadclearanceinfootprint=FALSE except(0: Arc-Hole Track-Hole SMDPad-Hole THPad-Hole Via-Hole Fill-Hole Poly-Hole Region-Hole Text-Hole)
Clearance Clearance_+1.1V_CORE [((OnLayer('Bottom Layer') OR OnLayer('VCC3+CORE')) AND InNet('+1.1V_CORE') AND InPolygon)] p12: gap=0.1 ignorepadtopadclearanceinfootprint=FALSE except(0: Arc-Hole Track-Hole SMDPad-Hole THPad-Hole Via-Hole Fill-Hole Poly-Hole Region-Hole Text-Hole)
Clearance [All] p13 off: gap=0.1 ignorepadtopadclearanceinfootprint=FALSE except(0: Arc-Hole Track-Hole SMDPad-Hole THPad-Hole Via-Hole Fill-Hole Poly-Hole Region-Hole Text-Hole)
Clearance Clearance_PWR_GD [((OnLayer('Middle Layer 1') OR OnLayer('Signal 1')) AND InNet('PWR_GD') AND InPolygon)] p14: gap=0.1 ignorepadtopadclearanceinfootprint=FALSE except(0: Arc-Hole Track-Hole SMDPad-Hole THPad-Hole Via-Hole Fill-Hole Poly-Hole Region-Hole Text-Hole)
Clearance Clearance_+3.3V_FCLORE [((OnLayer('Middle Layer 1') OR OnLayer('+5V SATA')) AND InNet('+3.3V_FLCORE') AND InPolygon)] p15: gap=0.1 ignorepadtopadclearanceinfootprint=FALSE except(0: Arc-Hole Track-Hole SMDPad-Hole THPad-Hole Via-Hole Fill-Hole Poly-Hole Region-Hole Text-Hole)
Clearance Clearance_+5V_SATA [((OnLayer('Bottom Layer') OR OnLayer('+5V SATA')) AND InNet('+5V_SATA') AND InPolygon)] p16: gap=0.1 ignorepadtopadclearanceinfootprint=FALSE except(0: Arc-Hole Track-Hole SMDPad-Hole THPad-Hole Via-Hole Fill-Hole Poly-Hole Region-Hole Text-Hole)
Clearance Clearance_+1.5V_VDDQ [((OnLayer('Middle Layer 1') OR OnLayer('Top Layer')) AND InNet('+1.5V_VDDQ') AND InPolygon)] p17: gap=0.1 ignorepadtopadclearanceinfootprint=FALSE except(0: Arc-Hole Track-Hole SMDPad-Hole THPad-Hole Via-Hole Fill-Hole Poly-Hole Region-Hole Text-Hole)
Clearance Clearance_+1.1V_VP [((OnLayer('Middle Layer 1') OR OnLayer('Top Layer')) AND InNet('+1.1V_VP') AND InPolygon)] p18: gap=0.1 ignorepadtopadclearanceinfootprint=FALSE except(0: Arc-Hole Track-Hole SMDPad-Hole THPad-Hole Via-Hole Fill-Hole Poly-Hole Region-Hole Text-Hole)
Clearance Clearance_+1.35V_DCDC [(OnLayer('Middle Layer 5 (PWR)') AND InNet('+1.35V_DCDC') AND InPolygon)] p19: gap=0.1 ignorepadtopadclearanceinfootprint=FALSE except(0: Arc-Hole Track-Hole SMDPad-Hole THPad-Hole Via-Hole Fill-Hole Poly-Hole Region-Hole Text-Hole)
Clearance "Board Edge Clearance" [All vs OnLayer('Keep-out layer')] p20: gap=0.3 ignorepadtopadclearanceinfootprint=FALSE except(0: Arc-Hole Track-Hole SMDPad-Hole THPad-Hole Via-Hole Fill-Hole Poly-Hole Region-Hole Text-Hole)
Clearance "Poly Clearance" [InPolygon AND OnLayer('Top Layer') AND  InNet('GND')] p21: gap=0.2 ignorepadtopadclearanceinfootprint=FALSE except(0: Arc-Hole Track-Hole SMDPad-Hole THPad-Hole Via-Hole Fill-Hole Poly-Hole Region-Hole Text-Hole)
Clearance "Generic Clearance" [All] p22: gap=0.15 ignorepadtopadclearanceinfootprint=FALSE except(0: Arc-Hole Track-Hole SMDPad-Hole THPad-Hole Via-Hole Fill-Hole Poly-Hole Region-Hole Text-Hole)
ComponentClearance [All] p1 off: gap=0.254 collisioncheckmode=3 verticalgap=0.254 showdistances=FALSE
DiffPairsRouting [All] p1: maxlimit=0.254 minlimit=0.2 mostfreqgap=0.2 toplayer_minwidth=0.1 toplayer_maxwidth=0.254 toplayer_prefwidth=0.2 midlayer1_minwidth=0.1 midlayer1_maxwidth=0.254 midlayer1_prefwidth=0.2 midlayer3_minwidth=0.1 midlayer3_maxwidth=0.254 midlayer3_prefwidth=0.2 midlayer4_minwidth=0.1 midlayer4_maxwidth=0.254 midlayer4_prefwidth=0.2 midlayer5_minwidth=0.1 midlayer5_maxwidth=0.254 midlayer5_prefwidth=0.2 midlayer7_minwidth=0.1 midlayer7_maxwidth=0.254 midlayer7_prefwidth=0.2 midlayer8_minwidth=0.1 midlayer8_maxwidth=0.254 midlayer8_prefwidth=0.2 bottomlayer_minwidth=0.1 bottomlayer_maxwidth=0.254 bottomlayer_prefwidth=0.2 maxuncoupledlength=12.7
FabricationTestPointUsage [All] p1 off: valid=0 allowmultiple=FALSE
FabricationTestpoint [All] p1 off: side=3 testpointundercomponent=TRUE minsize=1.016 maxsize=2.54 preferedsize=1.524 minholesize=0 maxholesize=1.016 preferedholesize=0.813 testpointgrid=0.025 allowsidetop=TRUE allowsidebottom=TRUE usegrid=TRUE gridtolerance=0
Height [All] p1: minheight=0 maxheight=50.4 prefheight=12.7
HoleSize [All] p1: absolutevalues=TRUE maxlimit=10 minlimit=0.025 maxpercent=80.000 minpercent=20.000
MatchedLengths MatchedLengths_ALL [InDifferentialPairClass('RX_TX')] p1: tolerance=25.4 checknetsindiffpair=FALSE checkdiffpairvsdiffpair=TRUE checkxsignals=TRUE checkothers=TRUE usedelayunits=TRUE delaytolerance=100.000000
MatchedLengths MatchedLengths_RX [InxSignalClass('RX')] p2: tolerance=25.4 checknetsindiffpair=TRUE checkdiffpairvsdiffpair=FALSE checkxsignals=FALSE checkothers=FALSE usedelayunits=TRUE delaytolerance=100.000000
MatchedLengths MatchedLengths_TX [InxSignalClass('TX')] p3: tolerance=25.4 checknetsindiffpair=TRUE checkdiffpairvsdiffpair=FALSE checkxsignals=FALSE checkothers=FALSE usedelayunits=TRUE delaytolerance=100.000000
MatchedLengths [InxSignalClass('XTAL')] p4: tolerance=1 checknetsindiffpair=FALSE checkdiffpairvsdiffpair=TRUE checkxsignals=TRUE checkothers=TRUE
MatchedLengths "Schematic Matched Net Lengths_SATA_RX" [InNetClass('SATA')] p5: tolerance=25.4 checknetsindiffpair=FALSE checkdiffpairvsdiffpair=TRUE checkxsignals=TRUE checkothers=TRUE usedelayunits=TRUE delaytolerance=100.000000
MinimumAnnularRing "MinimumAnnularRing_Pad 1.6+" [PadIsPlated and (HoleSize > AsMM(1.6))] p1 off: minimumring=0.4
MinimumAnnularRing "MinimumAnnularRing_Pad 0.8-1.6" [PadIsPlated and (HoleSize > AsMM(1.1)) and (HoleSize <= AsMM(1.6))] p2 off: minimumring=0.275
MinimumAnnularRing "MinimumAnnularRing_Pad 0.4-0.7" [PadIsPlated and (HoleSize <= AsMM(1.1))] p3 off: minimumring=0.25
MinimumSolderMaskSliver [All] p1: minsoldermaskwidth=0.05
PlaneConnect [All] p1: planeconnectstyle=Relief reliefexpansion=0.508 reliefentries=4 reliefconductorwidth=0.508 reliefairgap=0.254
PolygonConnect PolygonConnect_NETKP41 [InNet('NetKP4_1')] p1: connectstyle=Direct reliefconductorwidth=0.254 reliefentries=4 polygonreliefangle="90 Angle" airgapwidth=0.254
PolygonConnect PolygonConnect_NETVD11 [InNet('NetVD1_1')] p2: connectstyle=Direct reliefconductorwidth=0.254 reliefentries=4 polygonreliefangle="90 Angle" airgapwidth=0.254
PolygonConnect PolygonConnect_NETKP31 [InNet('NetKP3_1')] p3: connectstyle=Direct reliefconductorwidth=0.254 reliefentries=4 polygonreliefangle="90 Angle" airgapwidth=0.254
PolygonConnect PolygonConnect_GND [InNet('GND') AND (InComponentClass('GND Poly') OR IsVia)] p4: thpad.connectstyle=Relief thpad.reliefconductorwidth=0.254 thpad.reliefentries=4 thpad.polygonreliefangle="90 Angle" thpad.airgapwidth=0.254 smdpad.connectstyle=Relief smdpad.reliefconductorwidth=0.254 smdpad.reliefentries=4 smdpad.polygonreliefangle="90 Angle" smdpad.airgapwidth=0.254 via.connectstyle=Direct via.reliefconductorwidth=0.254 via.reliefentries=2 via.polygonreliefangle="90 Angle" via.airgapwidth=0.254
PolygonConnect PolygonConnect_+1.8V_FLIO [InNet('+1.8V_FLIO')] p5: connectstyle=Direct reliefconductorwidth=0.254 reliefentries=4 polygonreliefangle="90 Angle" airgapwidth=0.254
PolygonConnect PolygonConnect_+1.5V_DRAM [All vs InNet('+1.5V_DRAM')] p6: connectstyle=Direct reliefconductorwidth=0.254 reliefentries=4 polygonreliefangle="90 Angle" airgapwidth=0.254
PolygonConnect PolygonConnect_nDF [InNet('nDF')] p7: connectstyle=Direct reliefconductorwidth=0.254 reliefentries=4 polygonreliefangle="90 Angle" airgapwidth=0.254
PolygonConnect PolygonConnect_+1.8V_VCCFQ [InNet('+1.8V_VCCFQ')] p8: connectstyle=Direct reliefconductorwidth=0.254 reliefentries=4 polygonreliefangle="90 Angle" airgapwidth=0.254
PolygonConnect PolygonConnect_+1.1V_VCCK [All vs InNet('+1.1V_VCCK')] p9: connectstyle=Direct reliefconductorwidth=0.254 reliefentries=4 polygonreliefangle="90 Angle" airgapwidth=0.254
PolygonConnect PolygonConnect_+3.3_VCC3F [InNet('+3.3V_VCC3F')] p10: connectstyle=Direct reliefconductorwidth=0.254 reliefentries=4 polygonreliefangle="90 Angle" airgapwidth=0.254
PolygonConnect PolygonConnect_+3.3VCCAH [InNet('+3.3V_VCCAH')] p11: connectstyle=Direct reliefconductorwidth=0.254 reliefentries=4 polygonreliefangle="90 Angle" airgapwidth=0.254
PolygonConnect PolygonConnect_+3.3V_VCC3 [InNet('+3.3V_VCC3')] p12: connectstyle=Direct reliefconductorwidth=0.254 reliefentries=4 polygonreliefangle="90 Angle" airgapwidth=0.254
PolygonConnect PolygonConnect_+1.1V_CORE [InNet('+1.1V_CORE')] p13: connectstyle=Direct reliefconductorwidth=0.254 reliefentries=4 polygonreliefangle="90 Angle" airgapwidth=0.254
PolygonConnect PolygonConnect_PWR_GD [InNet('PWR_GD')] p14: connectstyle=Direct reliefconductorwidth=0.254 reliefentries=4 polygonreliefangle="90 Angle" airgapwidth=0.254
PolygonConnect PolygonConnect_+3.3V_FCLORE [InNet('+3.3V_FLCORE')] p15: connectstyle=Direct reliefconductorwidth=0.254 reliefentries=4 polygonreliefangle="90 Angle" airgapwidth=0.254
PolygonConnect PolygonConnect_+5V_SATA [InNet('+5V_SATA')] p16: connectstyle=Direct reliefconductorwidth=0.254 reliefentries=4 polygonreliefangle="90 Angle" airgapwidth=0.254
PolygonConnect PolygonConnect_+1.5V_VDDQ [InNet('+1.5V_VDDQ')] p17: connectstyle=Direct reliefconductorwidth=0.254 reliefentries=4 polygonreliefangle="90 Angle" airgapwidth=0.254
PolygonConnect PolygonConnect_+1.1V_VP [InNet('+1.1V_VP')] p18: connectstyle=Direct reliefconductorwidth=0.254 reliefentries=4 polygonreliefangle="90 Angle" airgapwidth=0.254
PolygonConnect PolygonConnect_+5V_MAIN [InNet('+5V_MAIN')] p19: connectstyle=Direct reliefconductorwidth=0.254 reliefentries=4 polygonreliefangle="90 Angle" airgapwidth=0.254
PolygonConnect PolygonConnect_GND_2 [IsComponentPad AND InNet('GND')] p20 off: connectstyle=Relief reliefconductorwidth=0.254 reliefentries=4 polygonreliefangle="90 Angle" airgapwidth=0.254
PolygonConnect [All] p21: connectstyle=Direct reliefconductorwidth=0.254 reliefentries=4 polygonreliefangle="90 Angle" airgapwidth=0.254
RoutingVias [All] p1: holewidth=1.2 width=1.2 viastyle="Through Hole" minholewidth=0.2 minwidth=0.4 maxholewidth=6 maxwidth=6
SilkToSilkClearance [All] p1 off: silktosilkclearance=0.254
SilkToSolderMaskClearance [IsPad vs Istext] p1: minsilkscreentomaskgap=0.1 clearancetoexposedcopper=TRUE
SolderMaskExpansion SolderMaskExpansion_Via [IsVia] p1: expansion=-2 istentingtop=FALSE
SolderMaskExpansion [All] p2: expansion=0.1 istentingtop=FALSE
Width [All] p1: maxlimit=5.08 minlimit=0.1 preferedwidth=0.381 toplayer_maxwidth=2 bottomlayer_maxwidth=2 minimp=50.000000 maximp=50.000000 favimp=50.000000
18 further rules are at their usual default settings.

## Classes and differential pairs
component class "GND Poly": C1 C2 C3 C4 C5 C8 C9 C10 C11 C12 C13 C14 C15 C16 C17 C18 C19 C20 C21 C22 C23 C24 C25 C26 C27 C28 C29 C30 C31 C32 C33 C34 C35 C36 C37 C38 C39 C41 C42 C43 C44 C45 C46 C47 C48 C49 C50 C51 C52 C53 C54 C55 C56 C57 C58 C59 C60 C61 C62 C63 C64 C65 C66 C67 C68 C69 C70 C71 C72 C73 KP1 KP2 KP3 KP4 KP5 KP6 KP8 KP9 KP10 L1 L2 L3 L4 nPGIN R1 R2 R3 R4 R5 R6 R7 R8 R9 R10 R11 R12 R13 R14 R15 R16 R17 R18 R19 R20 R21 R22 R23 R24 R25 R26 R27 R28 R29 R30 R31 R32 R33 R34 R35 R36 R37 R38 R39 R40 R41 R42 R43 R44 R45 R46 R47 R48 R49 R50 R51 R52 R53 R54 R55 R56 R57 R58 R59 R60 R61 R62 R63 R64 R65 R66 R67 R68 R69 R70 R71 R72 R73 R74 R75 R76 SA1 SA2 VD1 VD2 VD3 VD4 VD5 VD6 VD7 VD8 VT1 VT2 VT3 VT4 VT5 VT6 VT7 VT8 VT9 VT10 VT11 X2 X3 X4 X5 X6
differential pair class RX_TX: RX TX
net class SATA: RX_N RX_P TX_N TX_P
differential pair TX: +TX_P -TX_N
differential pair RX: +RX_P -RX_N

## Components (designator, comment, footprint, x,y, rotation, side; value= is the part's Value field where it differs from the comment)
C1 "10uF,16V (0603)" 0603 31.034,13.933 r90 bottom
C2 "0.1uF,50V (0603)" 0603 29.134,13.943 r90 bottom
C3 "10uF,16V (0603)" 0603 74.56,37.08 r90 bottom
C4 "10uF,16V (0603)" 0603 70.94,17.88 r90 bottom
C5 "0.1uF,50V (0603)" 0603 89.205,48.92 r90 top
C6 "0.1uF,50V (0603)" 0603 71.95,37.82 r0 bottom
C7 "0.1uF,50V (0603)" 0603 68.31,18.59 r0 bottom
C8 "10nF,16V (0402)" 0402 10.925,48.59 r180 top
C9 "10nF,16V (0402)" 0402 10.925,47.33 r180 top
C10 "10nF,16V (0402)" 0402 10.925,44.8 r180 top
C11 "10nF,16V (0402)" 0402 10.925,43.54 r180 top
C12 "10uF,16V (0603)" 0603 62.93,37.71 r270 bottom
C13 "22pF,50V (0603)" 0603 25.745,17.063 r0 bottom
C14 "22pF,50V (0603)" 0603 66.39,23.41 r0 bottom
C15 "22pF,50V (0603)" 0603 70.05,42.62 r0 bottom
C16 "4.7uF,16V (0603)" 0603 66.66,36.03 r270 bottom
C17 "0.1uF,50V (0603)" 0603 15.485,23.216 r90 top
C18 "0.1uF,50V (0603)" 0603 89.095,41.12 r90 top
C19 "10uF,16V (0603)" 0603 25.745,20.797 r0 bottom
C20 "10uF,16V (0603)" 0603 17.335,23.216 r90 top
C21 "0.1uF,50V (0603)" 0603 68.525,36.03 r270 bottom
C22 "10uF,16V (0603)" 0603 66.38,28.99 r0 bottom
C23 "10uF,16V (0603)" 0603 25.745,22.663 r0 bottom
C24 "10uF,16V (0603)" 0603 70.05,46.347 r0 bottom
C25 "10uF,16V (0603)" 0603 66.39,27.13 r0 bottom
C26 "10uF,16V (0603)" 0603 70.05,48.21 r0 bottom
C27 "8.2pF,50V (0603)" 0603 30.379,25.548 r180 bottom
C28 "8.2pF,50V (0603)" 0603 30.379,27.435 r180 bottom
C29 "10uF,16V (0603)" 0603 36.117,40.27 r90 bottom
C30 "0.1uF,50V (0603)" 0603 35.015,33.9 r0 bottom
C31 "10uF,16V (0603)" 0603 43.325,38.47 r180 bottom
C32 "10uF,16V (0603)" 0603 47.125,40.39 r180 bottom
C33 "10uF,16V (0603)" 0603 59.355,21.82 r270 bottom
C34 "10uF,16V (0603)" 0603 56.955,37.22 r0 bottom
C35 "0.1uF,50V (0603)" 0603 43.325,36.613 r180 bottom
C36 "0.1uF,50V (0603)" 0603 50.405,38.963 r0 bottom
C37 "0.1uF,50V (0603)" 0603 57.495,21.82 r270 bottom
C38 "0.1uF,50V (0603)" 0603 54.81,39.65 r90 bottom
C39 "10nF,50V (0603)" 0603 30.135,34.58 r270 bottom
C40 "0.1uF,50V (0603)" 0603 43.325,34.757 r180 bottom
C41 "0.1uF,50V (0603)" 0603 50.405,37.09 r0 bottom
C42 "0.1uF,50V (0603)" 0603 55.645,21.82 r270 bottom
C43 "0.1uF,50V (0603)" 0603 52.955,39.65 r90 bottom
C44 "1uF,16V (0603)" 0603 35.017,35.762 r180 bottom
C45 "0.1uF,50V (0603)" 0603 43.325,32.9 r180 bottom
C46 "0.1uF,50V (0603)" 0603 50.405,44.58 r0 bottom
C47 "0.1uF,50V (0603)" 0603 56.395,24.38 r0 bottom
C48 "0.1uF,50V (0603)" 0603 53.685,37.1 r0 bottom
C49 "0.1uF,50V (0603)" 0603 47.125,44.13 r180 bottom
C50 "0.1uF,50V (0603)" 0603 56.395,26.23 r0 bottom
C51 "0.1uF,50V (0603)" 0603 56.665,39.65 r90 bottom
C52 "0.1uF,50V (0603)" 0603 50.405,42.707 r0 bottom
C53 "0.1uF,50V (0603)" 0603 56.395,28.08 r0 bottom
C54 "0.1uF,50V (0603)" 0603 47.125,42.26 r180 bottom
C55 "0.1uF,50V (0603)" 0603 56.395,29.93 r0 bottom
C56 "0.1uF,50V (0603)" 0603 50.405,40.835 r0 bottom
C57 "2.2nF,50V (0603)" 0603 34.267,40.25 r90 bottom
C58 "22pF,50V (0603)" 0603 22.885,34.56 r90 bottom
C59 "10uF,16V (0603)" 0603 19.145,34.56 r90 bottom
C60 "10uF,16V (0603)" 0603 43.32,26.562 r180 bottom
C61 "10uF,16V (0603)" 0603 40.005,33.46 r180 bottom
C62 "10uF,16V (0603)" 0603 43.32,20.999 r180 bottom
C63 "10uF,16V (0603)" 0603 17.275,34.56 r90 bottom
C64 "0.1uF,50V (0603)" 0603 43.32,24.708 r180 bottom
C65 "0.1uF,50V (0603)" 0603 40.005,35.31 r180 bottom
C66 "0.1uF,50V (0603)" 0603 46.581,22.854 r0 bottom
C67 "10uF,16V (0603)" 0603 15.405,34.56 r90 bottom
C68 "0.1uF,50V (0603)" 0603 40.005,37.16 r180 bottom
C69 "0.1uF,50V (0603)" 0603 46.576,21 r0 bottom
C70 "0.1uF,50V (0603)" 0603 49.835,22.854 r0 bottom
C71 "0.1uF,50V (0603)" 0603 49.825,21 r0 bottom
C72 "0.1uF,50V (0603)" 0603 53.095,22.854 r0 bottom
C73 "0.1uF,50V (0603)" 0603 53.085,21 r0 bottom
D1 "SY8030DEC (DFN-6)" DFN-6(2x2) 26.887,14.304 r90 bottom
D2 "SY8030DEC (DFN-6)" DFN-6(2x2) 71.62,40.05 r90 bottom
D3 "SY8030DEC (DFN-6)" DFN-6(2x2) 67.94,20.85 r90 bottom
D4 "SY8047QDC (QFN-16)" QFN-16 31.295,38.25 r90 bottom
D5 "SM619GEFDFST (ZIF TFBGA-90)" ASS3145-BGA90-16X20-1-1.67-ZS 49.861,30.49 r180 top locked
KP1 "+3.3V" Plosh15X06 31.104,16.55 r90 top
KP2 "EN_1.1V" Plosh15X06 31.104,17.96 r90 top
KP3 "+3.3V_SATA" Plosh15X06 11.065,33.385 r270 top
KP4 "+12V_SATA" Plosh15X06 11.065,18.145 r90 top
KP5 "DEVSLP" Plosh15X06 59.115,40.441 r90 bottom
KP6 "ENRLS" Plosh15X06 38.432,29.8 r90 bottom
KP8 "nPGS" Plosh15X06 38.425,31.22 r90 bottom
KP9 "nWP" Plosh15X06 63.17,30.269 r90 bottom
KP10 "nQE" Plosh15X06 63.17,31.705 r270 bottom
L1 "DFE252012P-2R2M (2512)" "DFE252012P-2R2M (2512)" 24.205,14.383 r90 bottom value={Value}
L2 "DFE252012P-2R2M (2512)" "DFE252012P-2R2M (2512)" 68.95,40.02 r90 bottom value={Value}
L3 "DFE252012P-2R2M (2512)" "DFE252012P-2R2M (2512)" 65.27,20.81 r90 bottom value={Value}
L4 "SRP4012TA-1R0M (4012)" "SRP4012TA-1R0M (4012)" 26.425,35.69 r270 bottom value={Value}
nPGIN "nPGIN" Plosh15X06 47.361,17.86 r90 bottom (schematic designator KP7)
R1 "47 (0603)" 0603 78.47,45.96 r90 bottom
R2 "47 (0603)" 0603 76.19,17.99 r270 bottom
R3 "47k (0603)" 0603 80.35,45.97 r270 bottom
R4 "47k (0603)" 0603 74.31,18 r90 bottom
R5 "0 (0603)" 0603 32.957,16.499 r0 bottom
R6 "10k (0603)" 0603 79.42,38.61 r270 bottom
R7 "10k (0603)" 0603 72.72,24.89 r90 bottom
R8 "100k (0603)" 0603 21.865,15.173 r270 bottom
R9 "10k (0603)" 0603 76.42,43.74 r90 bottom
R10 "10k (0603)" 0603 70.83,24.89 r90 bottom
R11 "20k (0603)" 0603 89.205,45.65 r90 top
R12 "100 (0603)" 0603 29.674,16.506 r0 bottom
R13 "20k (0603)" 0603 91.055,48.92 r90 top
R14 "100k (0603)" 0603 66.63,40.81 r270 bottom
R15 "100k (0603)" 0603 62.95,21.62 r270 bottom
R16 "4.7k (0603)" 0603 91.055,45.65 r270 top
R17 "0 (0402)" 0402 13.205,48.59 r0 top
R18 "0 (0402)" 0402 13.205,47.33 r0 top
R19 "0 (0402)" 0402 13.205,44.8 r0 top
R20 "0 (0402)" 0402 13.205,43.54 r0 top
R21 "C1F3, 3A, 63V DC Fuse (1206)" 1206 14.095,26.386 r180 top
R22 "30k (0603)" 0603 25.745,18.929 r180 bottom
R23 "2.4k (0603)" 0603 28.413,19.078 r90 bottom
R24 "1k (0603)" 0603 64.795,37.71 r90 bottom
R25 "1k (0603)" 0603 64.802,34.42 r90 bottom
R26 "39k (0603)" 0603 30.35,19.078 r90 bottom
R27 "20k (0603)" 0603 89.205,37.86 r90 top
R28 "78k (0603)" 0603 70.05,44.483 r180 bottom
R29 "680 (0603)" 0603 72.64,43.75 r90 bottom
R30 "59k (0603)" 0603 66.39,25.27 r180 bottom
R31 "39k (0603)" 0603 68.96,24.1 r270 bottom
R32 "20k (0603)" 0603 90.945,41.15 r90 top
R33 "39k (0603)" 0603 74.51,43.74 r90 bottom
R34 "4.7k (0603)" 0603 91.055,37.86 r270 top
R35 "1M (0603)" 0603 38.884,26.449 r90 bottom
R36 "100 (0603)" 0603 36.316,27.151 r0 bottom
R37 "0 (0603)" 0603 45.965,37.83 r270 bottom
R38 "0 (0603)" 0603 47.825,37.83 r270 bottom
R39 "0 (0603)" 0603 59.655,24.37 r180 bottom
R40 "0 (0603)" 0603 56.423,35.36 r180 bottom
R41 "1k (0603)" 0603 32.015,34.57 r270 bottom
R42 "10 (0603)" 0603 35.015,37.64 r0 bottom
R43 "1k (0603)" 0603 40.005,40.41 r180 bottom
R44 "51k (0603)" 0603 31.295,41.08 r180 bottom
R45 "267k (0603)" 0603 21.016,34.56 r270 bottom
R46 "0 (0603)" 0603 22.155,37.17 r180 bottom
R47 "59k (0603)" 0603 22.885,39.72 r90 bottom
R48 "0 (0603)" 0603 43.32,28.416 r0 bottom
R49 "0 (0603)" 0603 40.765,30.9 r90 bottom
R50 "0 (0603)" 0603 43.32,22.854 r0 bottom
R51 "20k (0603)" 0603 59.675,29.93 r180 bottom
R52 "20k (0603)" 0603 59.675,31.79 r180 bottom
R53 "2k (0603)" 0603 43.32,30.27 r0 bottom
R54 "0 (0603)" 0603 56.395,33.64 r180 bottom
R55 "0 (0603)" 0603 56.405,31.78 r180 bottom
R56 "0 (0603)" 0603 59.665,26.24 r180 bottom
R57 "33k (0603)" 0603 59.665,33.64 r180 bottom
R58 "1k (0603)" 0603 59.685,28.08 r180 bottom
R59 "240 (0603)" 0603 59.692,35.38 r180 bottom
R60 "4.7k (0603)" 0603 86.99,32.31 r180 top
R61 "1.5k (0603)" 0603 70.105,56.66 r0 top
R62 "1.5k (0603)" 0603 78.47,56.74 r0 top
R63 "20k (0603)" 0603 86.99,30.42 r180 top
R64 "1k (0603)" 0603 78.47,54.871 r180 top
R65 "20k (0603)" 0603 78.47,53 r0 top
R66 "1.5k (0603)" 0603 86.99,34.2 r180 top
R67 "4.7k (0603)" 0603 86.99,26.06 r180 top
R68 "20k (0603)" 0603 86.99,24.19 r180 top
R69 "1.5k (0603)" 0603 87.175,56.88 r0 top
R70 "1.5k (0603)" 0603 70.105,54.74 r0 top
R71 "1.5k (0603)" 0603 87.185,55.02 r180 top
R72 "1.5k (0603)" 0603 70.105,52.866 r180 top
R73 "1.5k (0603)" 0603 86.99,27.92 r180 top
R74 "20k (0603)" 0603 87.165,53.15 r0 top
R75 "20k (0603)" 0603 70.105,50.99 r0 top
R76 "0 (0603)" 0603 76.335,31.705 r270 bottom
SA1 "KLS7-TS3401" KLS7-TS3401 85.175,49.1 r90 top
SA2 "KLS7-TS3401" KLS7-TS3401 85.045,41.4 r90 top
VD1 "SS2040FL (SOD-123FL)" SOD-123 13.935,28.726 r0 top
VD2 "SMAJ5.0CA (SMA/DO-214AC)" SMA(DO-214AC) 12.965,22.056 r90 top
VD3 "LED GREEN(0603)" 0603(LED) 73.455,56.67 r0 top
VD4 "LED GREEN(0603)" 0603(LED) 81.83,56.74 r0 top
VD5 "LED GREEN(0603)" 0603(LED) 90.27,34.2 r180 top
VD6 "LED GREEN(0603)" 0603(LED) 90.27,27.92 r180 top
VD7 "LED GREEN(0603)" 0603(LED) 90.465,56.86 r0 top
VD8 "LED GREEN(0603)" 0603(LED) 73.455,54.74 r0 top
VT1 "MMBT3904L*G ONS" SOT-23 79.42,42.62 r0 bottom
VT2 "MMBT3904L*G ONS" SOT-23 75.28,21.52 r180 bottom
VT3 "MMBT5551L" SOT-23 86.552,45.5 r90 top
VT4 "MMBT3904L*G ONS" SOT-23 76.52,40.24 r90 bottom
VT5 "MMBT3904L*G ONS" SOT-23 71.41,21.5 r270 bottom
VT6 "MMBT5551L" SOT-23 86.552,37.703 r90 top
VT7 "BSS209PW" SOT-323 90.21,31.75 r0 top
VT8 "MMBT3904L*G ONS" SOT-23 81.74,53.95 r270 top
VT9 "BSS209PW" SOT-323 90.21,25.57 r0 top
VT10 "MMBT3904L*G ONS" SOT-23 90.455,54.05 r270 top
VT11 "MMBT3904L*G ONS" SOT-23 73.375,51.98 r270 top
X1 "SATA CONNECTOR (5622-6309-ML)" "SATA CONNECTOR" 8.115,34.02 r0 top locked
X2 "PLD6-2" PLD6-2 25.835,28.38 r90 top
X3 "PLD4-2,54" PLD4-2,54 71.285,33.54 r270 top
X4 "PBS34-2,54" PBS34-2,54 94.841,55.61 r270 top locked
X5 "PBS34-2,54" PBS34-2,54 61.821,6.07 r180 top locked
X6 "PBS34-2,54" PBS34-2,54 61.821,64.51 r180 top
ZQ1 "50.0-JXS11-8-10-20-T1-FU-LF (50MHz,1.6x1.2mm)" "50.0-JXS11-8-10-20-T1-FU-LF (50MHz,1.6x1.2mm)" 33.385,26.336 r315 bottom

## Footprints (in the part's own frame and the unit in brackets; to place one, negate y for a bottom-side part, rotate by r counter-clockwise, add the part's x,y. Pads: shape width x height; smd on the part's side, far side on the other; paste and mask are expansions set on the pad)
"50.0-JXS11-8-10-20-T1-FU-LF (50MHz,1.6x1.2mm)" [mm] "HC-49SM"
  rect 0.55x0.45 smd mask+0.05: 1(0.525,0.375)
  rrect50% 0.55x0.45 smd mask+0.05: 2(-0.525,0.375) 3(-0.525,-0.375) 4(0.525,-0.375)
  silkscreen extent -0.97,-0.76 0.97,0.76
0402 [mm]
  rect 0.6x0.6 smd: 1(-0.5,0) 2(0.5,0)
  silkscreen extent -1.04,-0.53 1.03,0.53
0603 [mm]
  rect 0.9x1 smd: 1(-0.76,0) 2(0.76,0)
  silkscreen extent -1.53,-0.82 1.53,0.82
0603(LED) [mm]
  rect 0.9x1 smd: 1(-0.76,0) 2(0.76,0)
  silkscreen extent -1.53,-0.82 1.53,0.82
1206 [mm]
  rect 1.5x1.8 smd: 1(-1.47,0) 2(1.47,0)
  silkscreen extent -2.54,-1.22 2.54,1.22
ASS3145-BGA90-16X20-1-1.67-ZS [mm]
  round 1.524 hole 2.3: 0(-13,14) 0(-13,-14) 0(13,14) 0(13,-14)
  round 1 hole 1.5: 0(-10.8,-7.5)
  round 1.524 hole 2: 0(10.8,7.5)
  round 0.5 smd: A1(-4,5) A2(-3,5) A3(-2,5) A4(-1,5) A5(0,5) A6(1,5) A7(2,5) A8(3,5) A9(4,5) B1(-4,4) B2(-3,4) B3(-2,4) B4(-1,4) B5(0,4) B6(1,4) B7(2,4) B8(3,4) B9(4,4) C1(-4,3) C2(-3,3) C3(-2,3) C4(-1,3) C5(0,3) C6(1,3) C7(2,3) C8(3,3) C9(4,3) D1(-4,2) D2(-3,2) D3(-2,2) D4(-1,2) D5(0,2) D6(1,2) D7(2,2) D8(3,2) D9(4,2) E1(-4,1) E2(-3,1) E3(-2,1) E7(2,1) E8(3,1) E9(4,1) F1(-4,0) F2(-3,0) F3(-2,0) F7(2,0) F8(3,0) F9(4,0) G1(-4,-1) G2(-3,-1) G3(-2,-1) G7(2,-1) G8(3,-1) G9(4,-1) H1(-4,-2) H2(-3,-2) H3(-2,-2) H4(-1,-2) H5(0,-2) H6(1,-2) H7(2,-2) H8(3,-2) H9(4,-2) J1(-4,-3) J2(-3,-3) J3(-2,-3) J4(-1,-3) J5(0,-3) J6(1,-3) J7(2,-3) J8(3,-3) J9(4,-3) K1(-4,-4) K2(-3,-4) K3(-2,-4) K4(-1,-4) K5(0,-4) K6(1,-4) K7(2,-4) K8(3,-4) K9(4,-4) L1(-4,-5) L2(-3,-5) L3(-2,-5) L4(-1,-5) L5(0,-5) L6(1,-5) L7(2,-5) L8(3,-5) L9(4,-5)
  silkscreen extent -15.5,-29.5 15.5,22.5
"DFE252012P-2R2M (2512)" [mm]
  rect 0.9x2.1 smd mask+0.05: 1(-0.85,0) 2(0.85,0)
  silkscreen extent -1.56,-1.28 1.56,1.27
DFN-6(2x2) [mm]
  rect 0.35x0.4 smd mask+0.08: 1(-0.65,-0.8) 2(0,-0.8) 3(0.65,-0.8) 4(0.65,0.8) 5(0,0.8) 6(-0.65,0.8)
  rect 1.45x0.85 smd mask+0.1: 7(0,0)
  silkscreen extent -1.19,-1.17 1.19,1.18
KLS7-TS3401 [mm]
  rect 0.7x1.5 smd: 1(1.075,2.025) 2(-1.075,2.025) 3(-1.075,-2.025) 4(1.075,-2.025)
  silkscreen extent -1.79,-2.1 1.78,2.1
PBS34-2,54 [mm]
  rect 1.8x1.8 hole 1: 1(0,0)
  round 1.8 hole 1: 2(2.54,0) 3(5.08,0) 4(7.62,0) 5(10.16,0) 6(12.7,0) 7(15.24,0) 8(17.78,0) 9(20.32,0) 10(22.86,0) 11(25.4,0) 12(27.94,0) 13(30.48,0) 14(33.02,0) 15(35.56,0) 16(38.1,0) 17(40.64,0) 18(0,2.54) 19(2.54,2.54) 20(5.08,2.54) 21(7.62,2.54) 22(10.16,2.54) 23(12.7,2.54) 24(15.24,2.54) 25(17.78,2.54) 26(20.32,2.54) 27(22.86,2.54) 28(25.4,2.54) 29(27.94,2.54) 30(30.48,2.54) 31(33.02,2.54) 32(35.56,2.54) 33(38.1,2.54) 34(40.64,2.54)
  silkscreen extent -1.27,-1.27 41.91,3.81
PLD4-2,54 [mm]
  rect 1.8x1.8 hole 1: 1(0,-0.01)
  round 1.8 hole 1: 2(0,2.53) 3(2.54,-0.01) 4(2.54,2.53)
  silkscreen extent -1.27,-1.28 3.81,3.8
PLD6-2 [mm]
  rect 1.4x1.4 hole 0.8: 1(-2,-1)
  round 1.4 hole 0.8: 2(-2,1) 3(0,-1) 4(0,1) 5(2,-1) 6(2,1)
  silkscreen extent -3,-2 3,2
Plosh15X06 [mm]
  oval 0.6x1.5 smd: 1(0,0)
  silkscreen extent -0.61,-1.07 0.61,1.07
QFN-16 [mm]
  rect 0.24x0.6 smd mask+0.05: 1(-0.75,-1.425) 2(-0.25,-1.425) 3(0.25,-1.425) 4(0.75,-1.425) 9(0.75,1.425) 10(0.25,1.425) 11(-0.25,1.425) 12(-0.75,1.425)
  rect 0.6x0.24 smd mask+0.05: 5(1.425,-0.75) 6(1.425,-0.25) 7(1.425,0.25) 8(1.425,0.75) 13(-1.425,0.75) 14(-1.425,0.25) 15(-1.425,-0.25) 16(-1.425,-0.75)
  rect 1.6x1.6 smd mask+0.05: 17(0,0)
  silkscreen extent -1.5,-1.5 1.5,1.5
"SATA CONNECTOR" [mm]
  rect 2.5x0.95 smd mask+0.05: 1(0,15.875) 2(0,14.605) 3(0,13.335) 4(0,12.065) 5(0,10.795) 6(0,9.525) 7(0,8.255) 8(0,1.905) 9(0,0.635) 10(0,-0.635) 11(0,-1.905) 12(0,-3.175) 13(0,-4.445) 14(0,-5.715) 15(0,-6.985) 16(0,-8.255) 17(0,-9.525) 18(0,-10.795) 19(0,-12.065) 20(0,-13.335) 21(0,-14.605) 22(0,-15.875)
  silkscreen extent -10.33,-22.83 2.52,22.92, body extent -10.34,-22.84 1.66,22.92, height 3.7
SMA(DO-214AC) [mm]
  rrect50% 1.55x1.67 smd: 1(-1.965,0)
  rect 1.55x1.67 smd: 2(1.965,0)
  silkscreen extent -2.25,-1.4 2.25,1.4
SOD-123 [mm]
  rrect50% 1.1x1 smd: 1(-1.9,0)
  rect 1.1x1 smd: 2(1.9,0)
  silkscreen extent -1.43,-0.85 1.43,0.85
SOT-23 [mm]
  rect 0.8x0.9 smd: 1(-0.95,-1) 2(0.95,-1) 3(0,1)
  silkscreen extent -1.55,-0.72 1.55,0.7
SOT-323 [mm]
  rect 0.6x0.8 smd: 1(-0.65,-0.8) 2(0.65,-0.8) 3(0,0.8)
  silkscreen extent -1,-0.05 1,0.6
"SRP4012TA-1R0M (4012)" [mm]
  rect 1.73x4.22 smd: 1(-1.84,0) 2(1.84,0)
  silkscreen extent -2.95,-2.4 2.95,2.4

## Part data
C1 C2 C3 C4 C5 C6 C7 C12 C13 C14 C15 C16 C17 C18 C19 C20 C21 C22 C23 C24 C25 C26 C27 C28 C29 C30 C31 C32 C33 C34 C35 C36 C37 C38 C39 C40 C41 C42 C43 C44 C45 C46 C47 C48 C49 C50 C51 C52 C53 C54 C55 C56 C57 C58 C59 C60 C61 C62 C63 C64 C65 C66 C67 C68 C69 C70 C71 C72 C73: library part "Cap (0603) AVX", ComponentHeigt=1.3, Firme=AVX, KIND=Конденсатор, Leadform=SMD, Packaging=0805
C8 C9 C10 C11: library part "Cap (0402) AVX", ComponentHeigt=1.3, Firme=AVX, KIND=Конденсатор, Leadform=SMD, Packaging=0805
KP1 KP2 KP3 KP4 KP5 KP6 KP8 KP9 KP10 nPGIN: library part Contplosh1.5x0.6
R1 R2 R3 R4 R5 R6 R7 R8 R9 R10 R11 R12 R13 R14 R15 R16 R22 R23 R24 R25 R26 R27 R28 R29 R30 R31 R32 R33 R34 R35 R36 R37 R38 R39 R40 R41 R42 R43 R44 R45 R46 R47 R48 R49 R50 R51 R52 R53 R54 R55 R56 R57 R58 R59 R60 R61 R62 R63 R64 R65 R66 R67 R68 R69 R70 R71 R72 R73 R74 R75 R76: library part "RC0603 Yageo", ComponentHeigt=0.5, Firme=Yageo, KIND=Резистор, Leadform=SMD, Packaging=0402
R17 R18 R19 R20: library part "RC0402 Yageo", ComponentHeigt=0.5, Firme=Yageo, KIND=Резистор, Leadform=SMD, Packaging=0402
R21: library part "RC1206 Yageo", ComponentHeigt=0.6, Firme=Yageo, KIND=Резистор, Leadform=SMD, Packaging=0805
VD3 VD4 VD5 VD6 VD7 VD8: library part LED(0603), ComponentHeigt=0.75, Firme=Kingbright, KIND="Светодиод L-1154GD Kingbright", Leadform="в отверстия", NN=24003000
D1 D2 D3 D4 D5 ZQ1: ComponentHeigt=1.8, Firme=Linear, KIND=Микросхема, Leadform=формована, Packaging=SOT-223
L1 L2 L3 L4: ComponentHeigt=3.2, Firm=TDK, KIND="Катушка индуктивности B82432T TDK", Name="Катушка индуктивности", Packaging="SIMIT 1812-T", Typ=B82432T
SA1 SA2: Component Heigt=7, Firme=TYCO, KIND="Кнопка 1-1977223-9 Tyco", Leadform=SMD, NN=25100175
VD1 VD2: ComponentHeigt=0.75, Firme=Kingbright, KIND="Светодиод L-1154GD Kingbright", Leadform="в отверстия", NN=24003000
VT1 VT2 VT4 VT5 VT8 VT10 VT11: ComponentHeigt=1.1, Firme=ONS, KIND="Транзистор MMBT3904L*G ONS", Leadform=SMD, NN=24006226, Packaging=SOT-23
VT3 VT6: ComponentHeigt=1.1, Firme=ONS, KIND="Транзистор MMBT5551L*G ONS", Leadform=SMD, NN=24007468, Packaging=SOT-23
VT7 VT9: ComponentHeigt=0.9, Firme=Infineon, KIND="Транзистор BSS209PW Infineon", Leadform=SMD, NN=24003422, Packaging=PG-SOT-323
X1 X2 X3 X4 X5 X6: ComponentHeigt=5.5, Name=Вилка, Specification="Вилка PLD2-2 *", Typ=PLD2-2

## Free pads (board coordinates)
  round 0 on Top Solder: 0(26.362,9.5) 5(26.4,9.2)

## Via types
v1: diameter 0.4, hole 0.2, Top Layer to Bottom Layer, tented both sides, 636 vias
v2: diameter 0.4, hole 0.2, Top Layer to Bottom Layer, 3 vias
v3: diameter 0.45, hole 0.2, Top Layer to Bottom Layer, tented both sides, 2 vias

## Nets (pads, with @x,y where several pads share a name; then routed paths per layer and width w, separated by ;. In a path a pad name is that pad's centre, name@x,y a point inside that pad or via, vN(x,y) a via of type N, cw(c..) or ccw(c..) an arc to the next point about the centre after c; other vN are vias at no path point)
+1.1V_CORE: C13.1 C19.1 C23.1 L1.2 R2.2 R22.2 R37.1 R38.1 R64.2 | length 0.1
  Bottom Layer w0.3: R22.2@24.945,19.003 R22.2@24.995,18.953 ; C13.1@24.985,17.063 C13.1@24.995,17.073
  other v1: 24.145,16.096 77.87,16.467 24.145,17.063 78.4,17.23 77.35,17.252 24.145,18.002 24.145,19.003 24.145,19.894 24.145,20.813 24.145,21.702 24.145,22.663 45.965,38.55 46.895,38.551 47.825,38.59 45.361,39.404 44.318,39.957 45.107,39.957 43.53,40.48 44.318,40.48 45.107,40.48 75.675,53.185 76.446,53.185 75.675,54.123 76.452,54.125 75.675,55.02 76.452,55.02
+1.1V_VCCK: C32.1 C36.1 C41.1 C46.1 C49.1 C52.1 C54.1 C56.1 D5.H6 D5.J6 D5.K4 D5.K6 D5.L4 D5.L6 D5.L7 R38.2 | length 4.9
  Top Layer w0.2: D5.K4@50.861,34.49 v1(51.361,34.99) ; D5.L4@50.861,35.49 v1(51.361,35.99)
  Top Layer w0.3: D5.L7@47.861,35.49 v1(48.361,34.99) ; v1(48.361,32.99) D5.H6@48.861,32.49 ; v1(48.361,33.99) D5.J6@48.861,33.49 ; v1(48.361,35.99) D5.L6@48.861,35.49 ; D5.K6@48.861,34.49 48.868,34.49 49.293,34.065 v1(49.3,34.065)
  other v1: 47.885,42.26 49.645,42.707 47.885,44.13 49.645,44.58
+1.1V_VP: C31.1 C35.1 C40.1 C45.1 D5.D7 D5.J7 D5.K7 R37.2 | length 2.3
  Top Layer w0.3: v1(47.361,27.97) 47.409,28.034 cw(c47.649,27.853) 47.437,28.066 D5.D7@47.861,28.49 ; v1(47.361,33.99) D5.J7@47.861,33.49 ; v1(47.361,34.99) D5.K7@47.861,34.49
  Bottom Layer w0.3: v1(44.085,36.615) 44.085,36.7 cw(c44.115,36.7) 44.115,36.73 cw(c44.115,36.75) C35.1@44.095,36.75
  other v1: 44.085,32.9 45.965,37.03 44.095,38.47
+1.5V_DRAM: C12.1 C14.1 C22.1 C25.1 L3.2 R1.2 R24.2 R30.2 R39.1 R71.2 | length 4.1
  Bottom Layer w0.3: v1(62.93,39.457) C12.1@62.93,38.47 R24.2@64.802,38.47 ; R1.2@78.47,46.72 v1(78.47,48)
  other v1: 64.58,23.41 65.63,23.41 62.93,24.23 60.415,24.37 62.245,24.695 63.235,25.01 62.535,25.27 64.58,25.27 65.63,25.27 61.725,25.48 62.245,25.892 63.235,25.892 62.745,26.34 63.235,26.8 64.58,26.8 65.63,27.13 64.58,28.99 65.62,28.99 85.155,53.1 84.518,53.573 85.199,54.05 84.518,54.271 84.518,55.02 85.575,55.02
+1.5V_VDDQ: C33.1 C37.1 C42.1 C47.1 C50.1 C53.1 C55.1 D5.C2 D5.C3 D5.D2 D5.E2 D5.J5 R39.2 | length 3.4
  Top Layer w0.3: D5.J5@49.861,33.49 v1(50.361,33.99) ; D5.C3@51.861,27.49 v1(52.361,26.99) ; D5.C2@52.861,27.49 v1(53.361,26.99) ; D5.D2@52.861,28.49 v1(53.361,27.99) ; D5.E2@52.861,29.49 52.899,29.49 53.273,29.116 v1(53.3,29.116)
  other v1: 60.721,20.324 61.515,20.324 60.721,21.35 61.515,21.35 60.721,22.16 61.515,22.16 55.645,22.58 57.495,22.58 59.355,22.58 60.725,23.13 61.515,23.13 58.365,23.41 59.511,23.41 55.605,24.38 58.895,24.37 55.615,26.23 55.635,28.08 55.635,30.03
+1.8V_FLIO: C15.1 C24.1 C26.1 L2.2 R28.2 R40.1 R72.2 | length 0
  Signal 1 w0.2: v1@69.242,44.492 v1(69.29,44.492)
  other v1: 57.938,34.907 57.308,35.36 57.938,35.5 57.938,36.127 66.5,50.5 67.282,50.5 66.5,51.5 67.282,51.5 66.5,52.25 67.282,52.25 66.5,52.866 67.282,52.866 68.16,52.866 69.29,52.866 66.5,53.573 67.282,53.573 68.16,53.573
+1.8V_VCCFQ: C34.1 C38.1 C43.1 C48.1 C51.1 D5.E8 D5.E9 D5.L2 D5.L3 R40.2 | length 2.8
  Top Layer w0.3: v1(45.361,28.99) D5.E9@45.861,29.49 ; v1(46.361,28.99) D5.E8@46.861,29.49 ; D5.L3@51.861,35.49 v1(52.361,35.99) ; D5.L2@52.861,35.49 v1(53.361,35.99)
  other v1: 55.662,35.36 52.925,37.1 56.07,37.251 52.955,38.049 55.75,38.12 52.955,38.89 53.855,38.9 54.81,38.89 55.75,38.89
+3.3V_FLCORE: C1.2 C2.2 C58.1 C59.1 C63.1 C67.1 D1.5 KP1.1 L4.2 R45.2 R48.1 R49.1 R50.1 R61.1 R62.1 R69.1 R70.1 | length 2.2
  Top Layer w0.3: KP1.1@31.104,16.49 KP1.1@31.164,16.55 ; KP1.1@31.5,16.6 31.976,16.124 v1@31.976,14.668
  other v1: 32.9,14.471 33.828,14.471 29.134,14.703 31.034,14.693 31.979,14.693 30.121,14.717 33.387,14.931 32.908,15.363 33.828,15.363 41.355,22.43 42.56,22.854 41.355,23.287 41.355,24.23 40.614,24.824 41.355,24.824 41.25,26.95 42.115,28.08 41.25,28.14 42.115,28.671 42.806,28.671 40.376,28.9 41.25,28.9 40.75,30.321 16.25,32.25 18.25,32.27 20.25,32.27 21.925,32.27 23.905,32.27 26.245,32.27 28.135,32.27 15.355,32.85 17.275,32.85 19.111,32.85 20.991,32.85 22.885,32.85 67.282,54.965 68.345,54.988 67.281,55.8 68.345,55.8 67.282,56.595 68.345,56.623 76.303,56.74 84.772,56.88 85.595,56.88 76.303,57.645 77.709,57.645 84.772,57.645 85.595,57.645 86.425,57.7 84.772,58.41 85.595,58.41 86.425,58.437 76.303,58.61 77.709,58.61 84.772,59.175 85.595,59.175 86.425,59.175
+3.3V_VCC3: C60.1 C64.1 D5.C9 R13.2 R32.2 R48.2 R51.1 R52.1 R53.1 R57.1 R63.2 R68.2 VT7.2 VT9.2 | length 13.6
  Top Layer w0.2: v1(45.361,26.99) D5.C9@45.861,27.49
  Top Layer w0.3: R68.2@86.23,24.19 86.324,24.096 86.324,23.416 86.52,23.22 89.92,23.22 90.797,24.097 90.797,24.707 VT9.2@90.86,24.77 ; R63.2@86.415,30.42 86.415,29.57 86.705,29.28 89.485,29.28 90.795,30.59 90.795,30.8 VT7.2@90.945,30.95 ; R13.2@90.945,49.79 R13.2@91.055,49.68
  other v1: 84.518,22.58 83.8,22.59 85.32,22.59 83.8,23.325 84.518,23.325 85.32,23.325 84.518,24.19 85.32,24.19 44.08,24.939 44.08,28.416 83.29,29.287 84.411,29.287 85.415,29.296 83.87,29.82 84.912,29.82 60.435,30.03 42.533,30.38 83.29,30.42 84.425,30.41 85.415,30.42 60.435,31.79 60.506,33.559 90.255,42.649 91.002,42.649 91.85,42.649 90.27,43.3 91.002,43.3 91.85,43.3 91.05,50.675 90.465,51.133 91.545,51.133 91.043,51.48 90.48,51.8 91.545,51.8
+3.3V_VCC3F: C62.1 C66.1 C69.1 C70.1 C71.1 C72.1 C73.1 D5.A4 D5.A6 D5.A7 D5.B4 D5.C5 D5.J1 R50.2 | length 4.6
  Top Layer w0.2: D5.B4@50.861,26.49 D5.A4@50.861,25.49 v1(51.361,24.99)
  Top Layer w0.3: v1(47.361,24.99) D5.A7@47.861,25.49 ; v1(48.361,24.99) D5.A6@48.861,25.49 ; v1(49.361,26.99) D5.C5@49.861,27.49 ; D5.J1@53.861,33.49 54.342,33.971 54.342,34.021 v1(54.361,34.04)
  other v1: 45.215,20.927 45.821,20.927 44.08,21 52.325,21 49.057,21.03 49.057,22.83 45.215,22.854 44.08,22.865 45.821,22.865 52.335,22.865
+3.3V_VCCAH: C61.1 C65.1 C68.1 D5.G8 D5.G9 R49.2 | length 1.4
  Top Layer w0.2: v1(45.361,31.99) D5.G9@45.861,31.49 ; v1(46.361,31.99) D5.G8@46.861,31.49
  other v1: 41.799,31.6 40.765,31.66 40.765,32.523
+5V_SATA: C3.2 C4.2 C6.2 C7.2 C17.2 C20.2 C29.1 C30.1 D2.5 D3.5 D4.11 D4.12 R6.2 R7.2 R9.2 R10.2 R21.2 R41.2 R42.2 R43.2 R44.1 VD2.2 | length 1.2
  Bottom Layer w0.3: R41.2@32.015,33.81 R41.2@32.025,33.8 ; R9.2@76.42,44.5 v1(76.42,45.65)
  other v1: 70.06,18.59 71.22,19.67 70.41,20.022 71.22,20.444 69.521,20.725 15.485,23.976 17.335,23.996 12.965,24.021 19.375,24.104 22.042,24.104 18,25.085 19.375,25.085 22.042,25.085 71.765,25.405 18,26.049 19.375,26.049 22.037,26.049 12.625,26.386 70.83,26.47 71.765,26.47 72.72,26.47 18,27.029 19.375,27.029 22.037,27.029 70.83,27.055 71.765,27.055 72.72,27.055 72.72,27.662 70.83,27.693 71.765,27.693 32.025,32.03 33.166,32.03 34.267,32.03 35.726,32.03 32.025,32.847 33.166,32.9 34.267,32.9 35.726,32.9 33.228,34.065 33.228,35.278 76.95,35.42 78.65,35.42 80.07,35.42 77.925,36.223 79.42,36.223 33.228,36.425 76.95,36.952 35.775,37.64 72.71,37.82 74.56,37.84 76.14,37.85 77.87,37.87 73.69,38.61 73.69,39.17 36.117,39.51 73.69,39.97 38.029,40.45 39.237,40.45 38.629,41.375 39.837,41.375 39.845,42.235 38.629,42.244
DRAM_PS: D3.4 R10.1 R58.1 VT5.3 | length 16.5
  Middle Layer 1 w0.2: v1(60.445,28.08) 65.59,28.08 69.55,24.12 v1(70.82,24.12)
  Bottom Layer w0.3: D3.4@68.74,21.5 VT5.3@70.41,21.5 70.57,21.66 70.57,23.87 v1(70.82,24.12) R10.1@70.83,24.13